# Altium PCB CLLC_PrimarySide_v12.PcbDoc (part 1 of 2)
Units mm, origin at the board's own origin, x right, y up, seen from the top; angles counter-clockwise.
Board outline 148.33 x 167.75 mm, 4 copper layers (GND, SIG, HVDC, GND/OUTPUT), stack 1.369 mm thick; 87 components, 34 nets, 218 pads, 476 vias.
Unrouted connection lines stored in the file: 15.
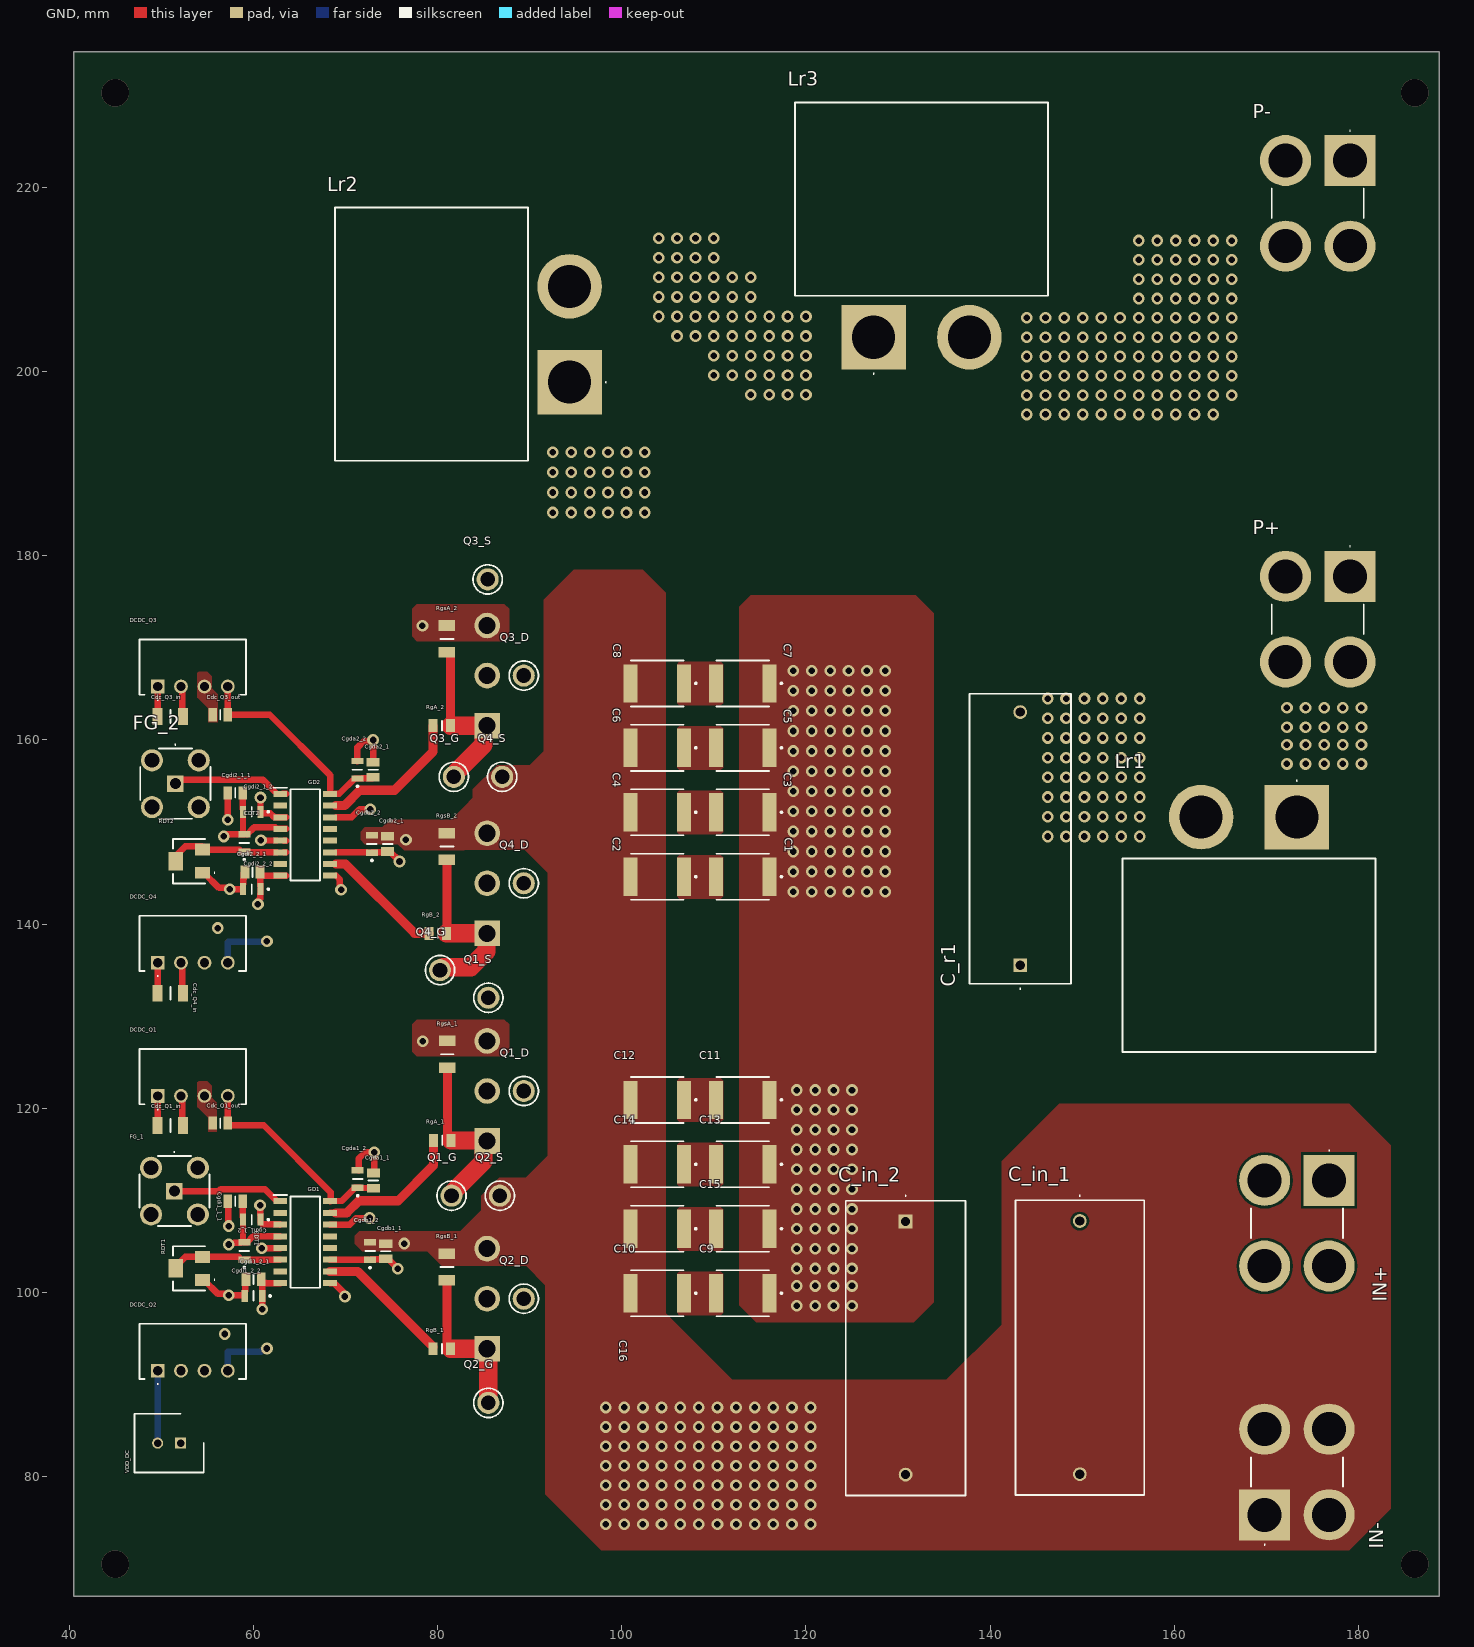
[diagram p0: GND view]
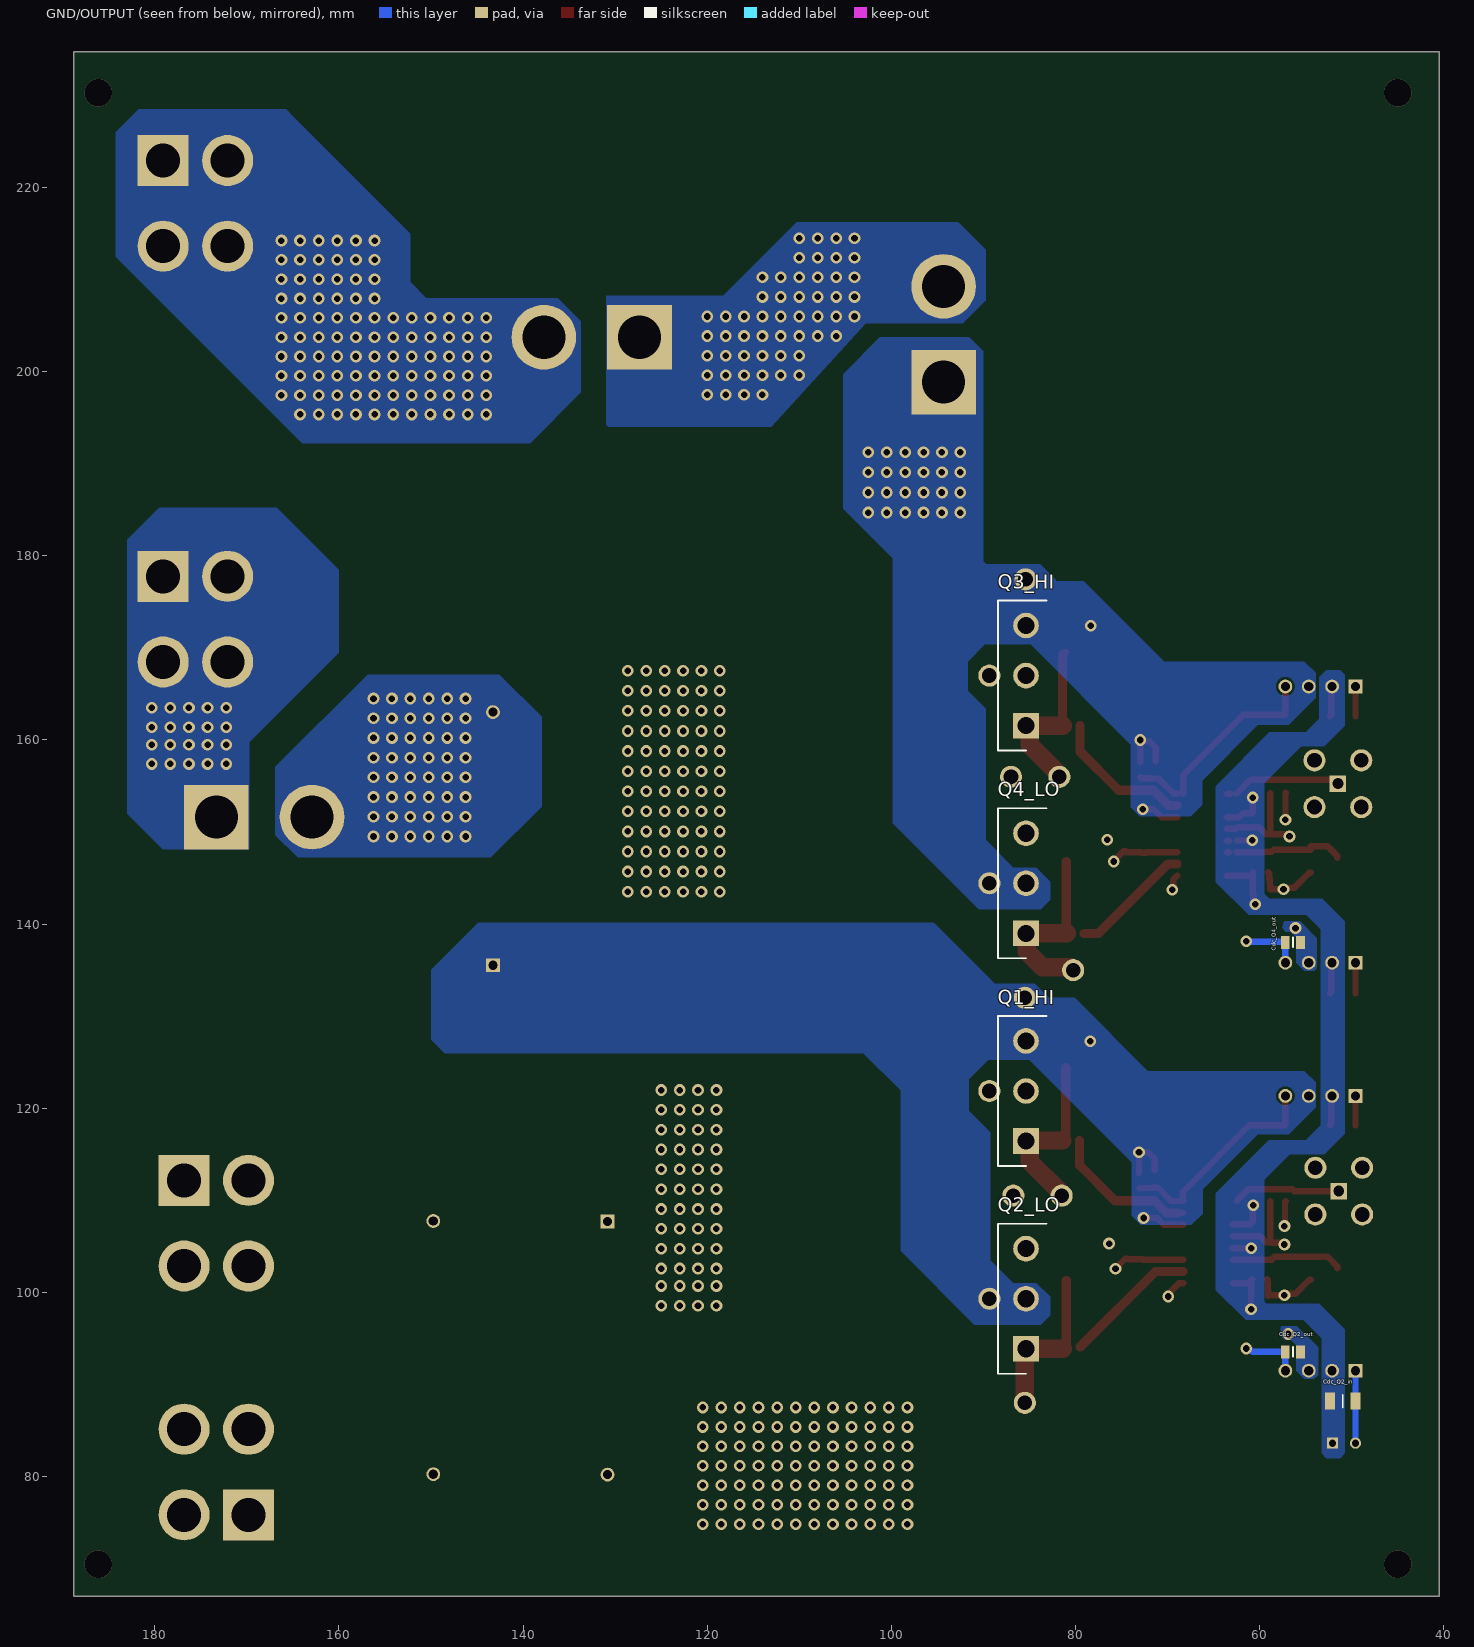
[diagram p1: GND/OUTPUT view, seen from below]
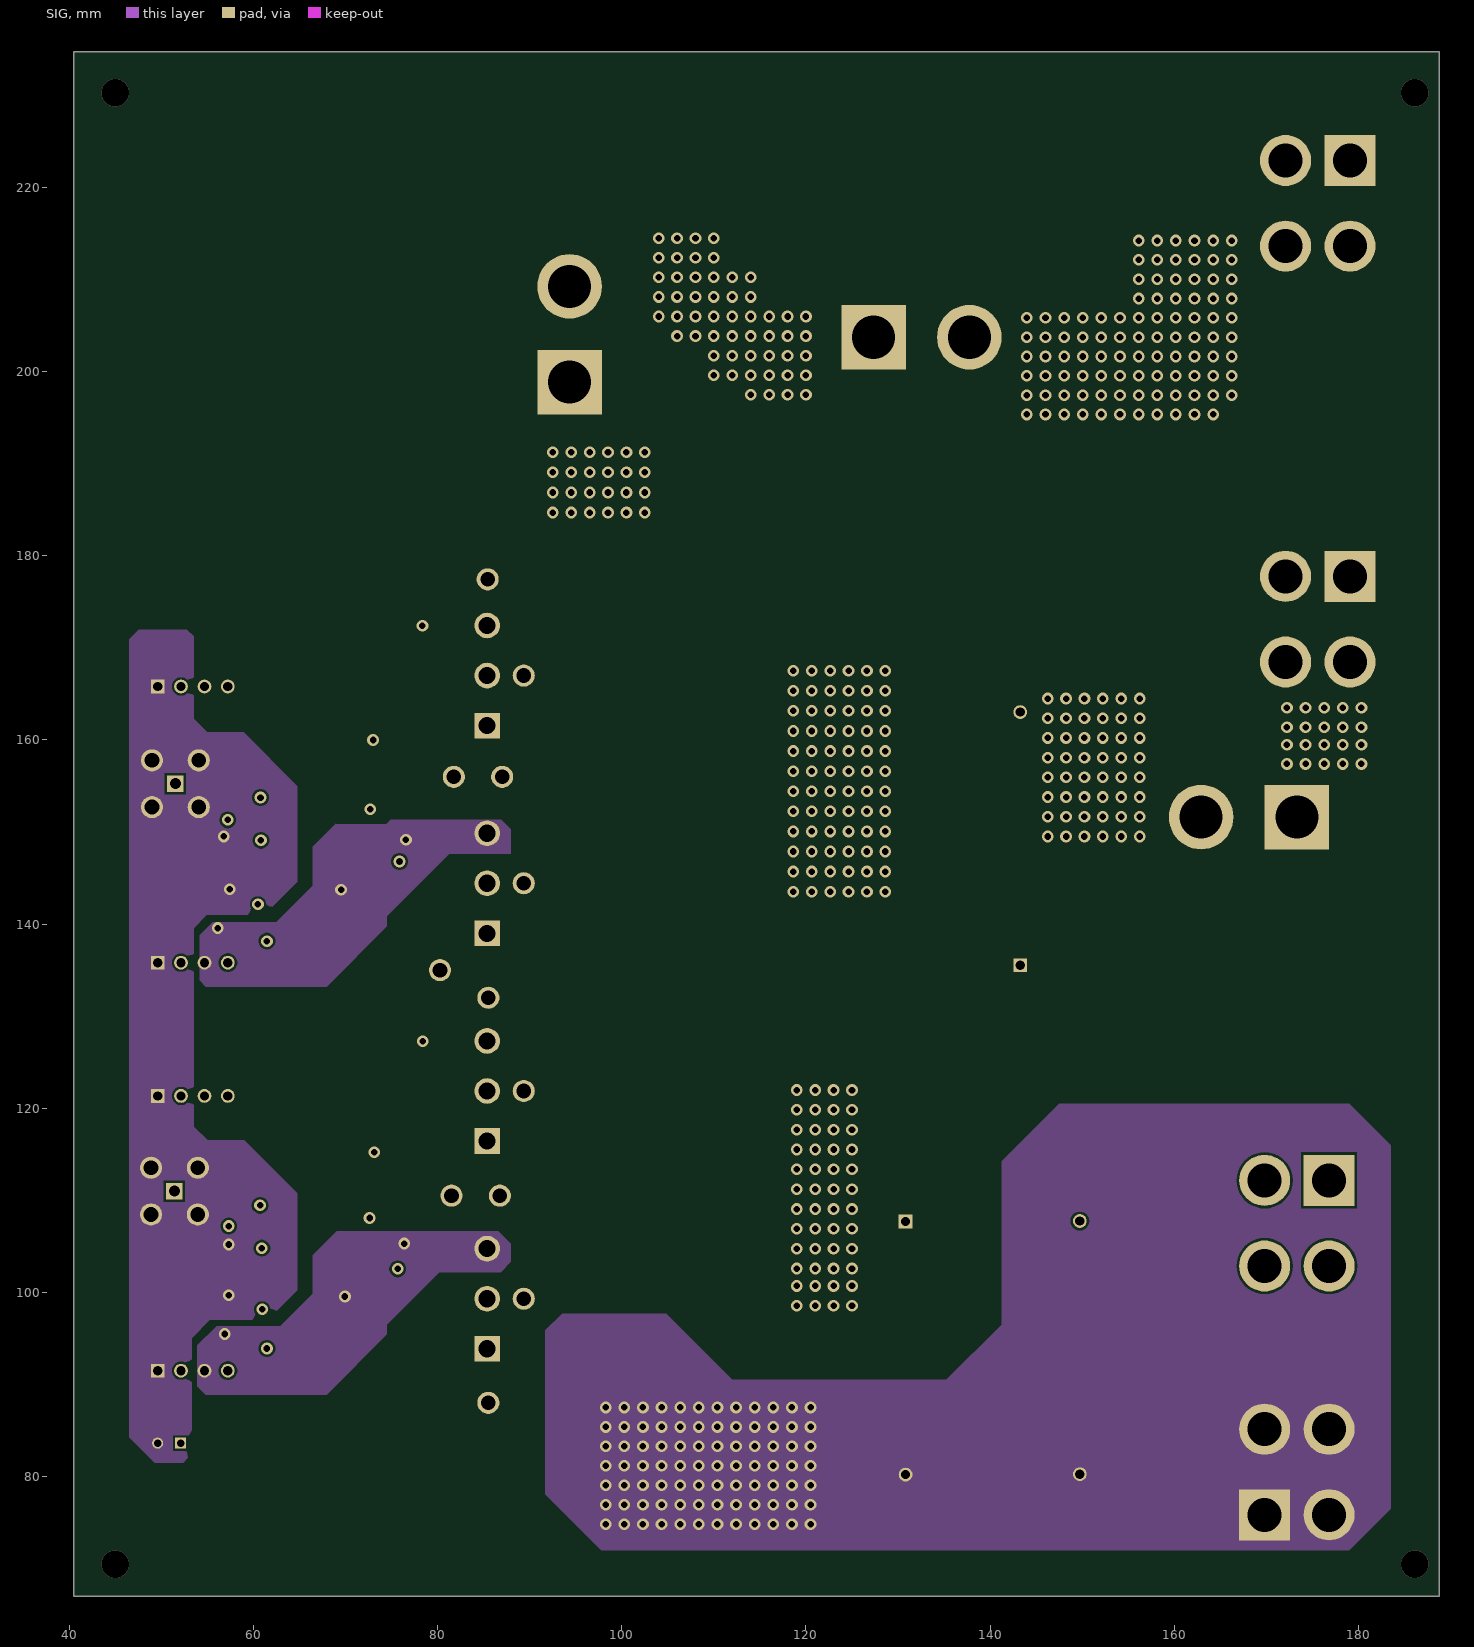
[diagram p2: SIG]
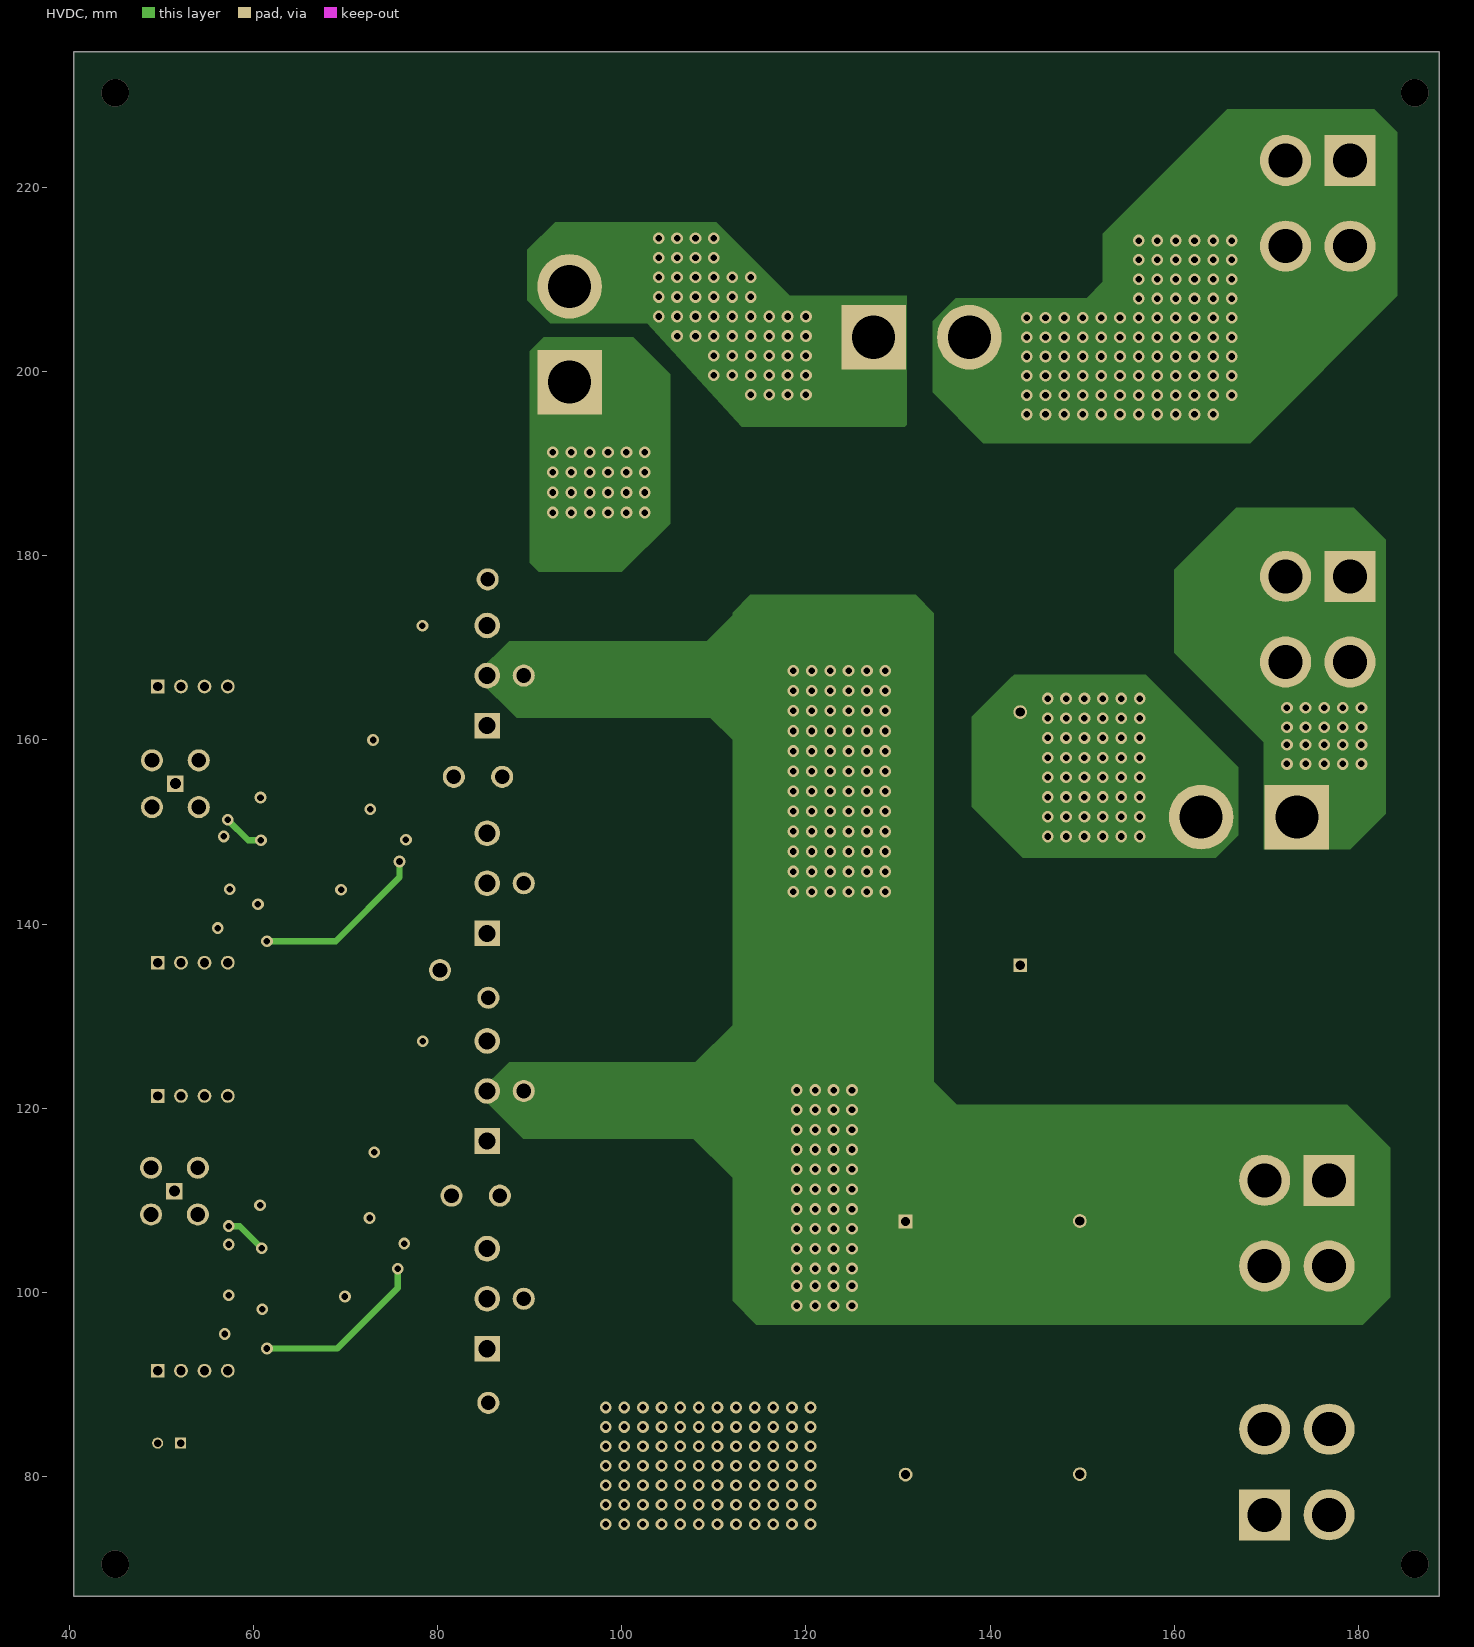
[diagram p3: HVDC]
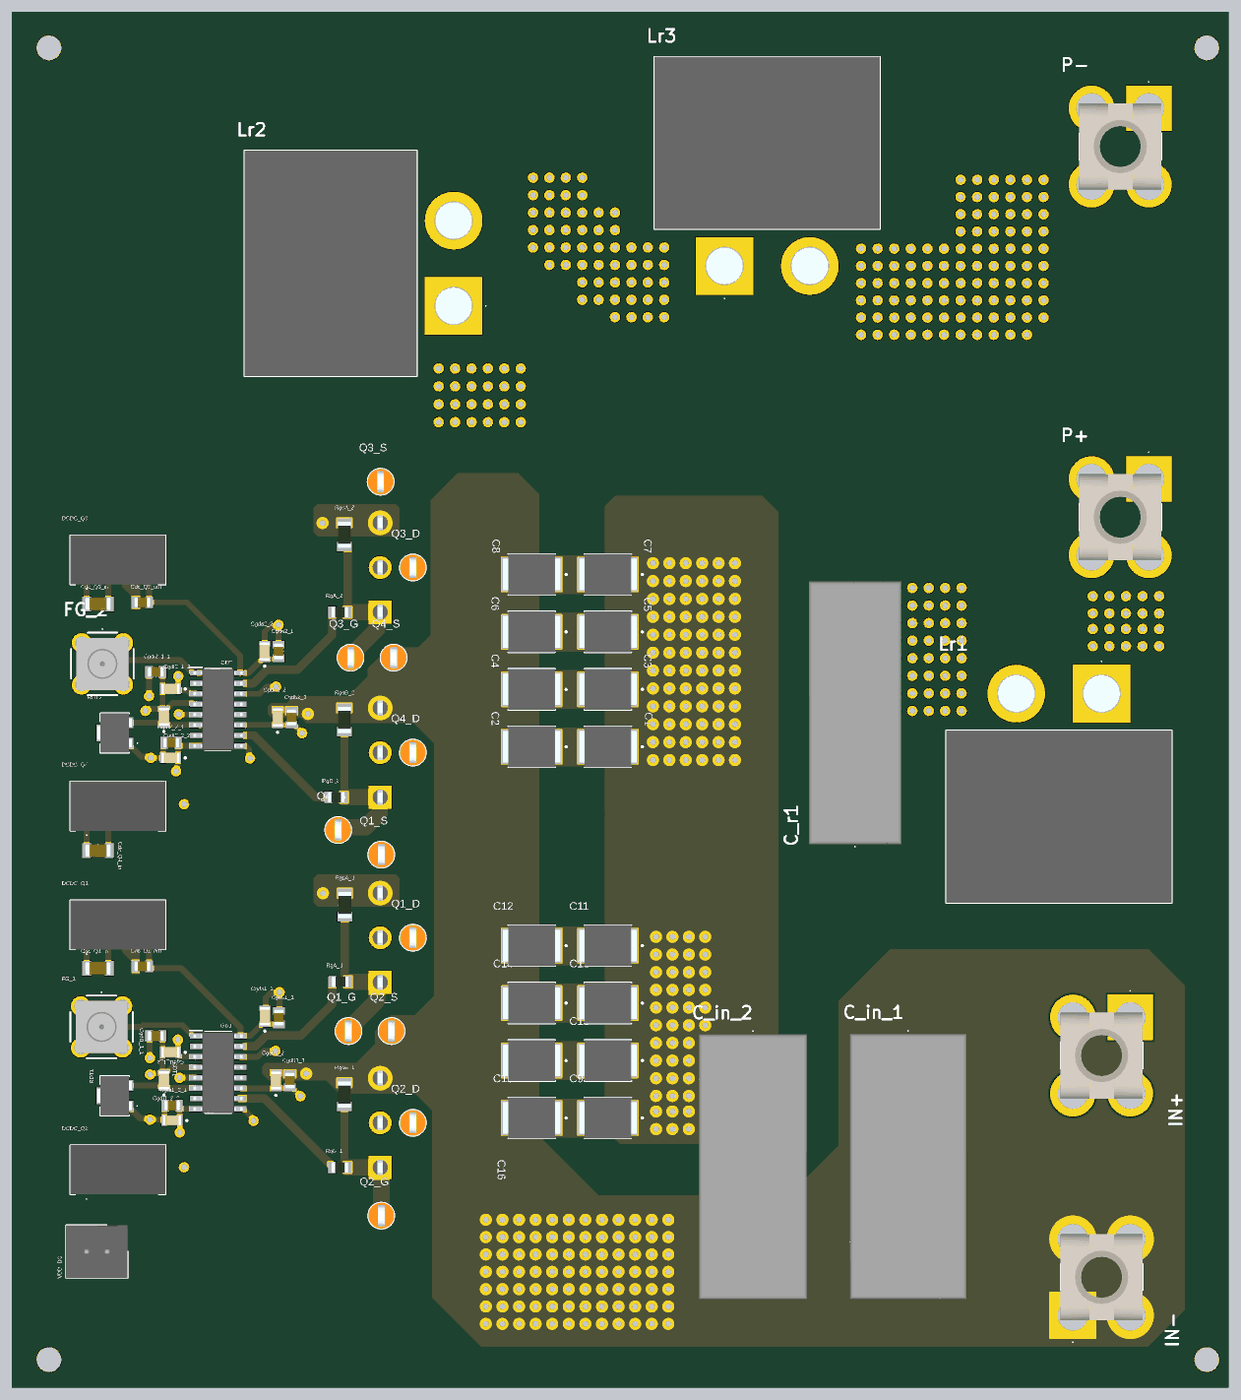
[diagram p4: 3D render of the assembled board from above, using the file's embedded part models]
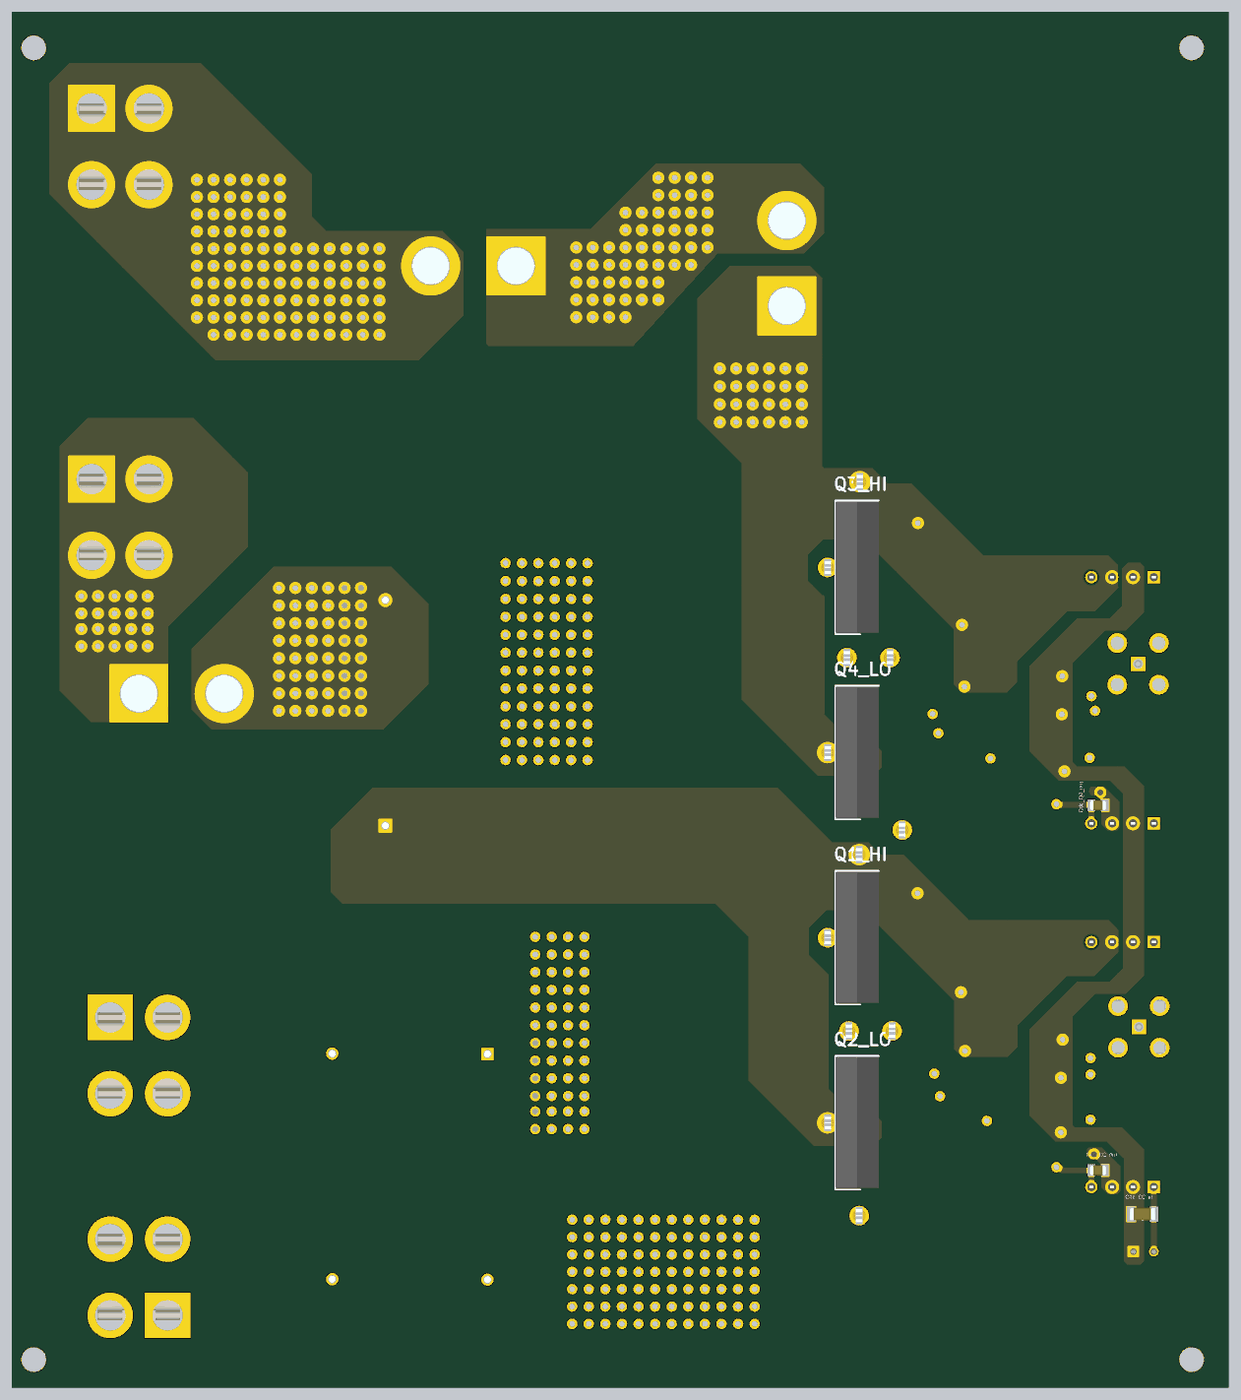
[diagram p5: 3D render of the assembled board from below, using the file's embedded part models]

## Layer stack, top to bottom
Top Solder: solder mask 0.0254, SM-001, Dk 4
GND: signal copper 0.035
Dielectric 1: prepreg 0.1295, PP-017, Dk 4.3
Dielectric 2: prepreg 0.1295, PP-017, Dk 4.3
SIG: signal copper 0.035
Dielectric 3: core 0.7112, Core-039, Dk 4.8
HVDC: signal copper 0.035
Dielectric 4: prepreg 0.1295, PP-017, Dk 4.3
Dielectric 5: prepreg 0.1295, PP-017, Dk 4.3
GND/OUTPUT: signal copper 0.035
Bottom Solder: solder mask 0.0254, SM-001, Dk 4

## Board outline
188.8,234.75 188.8,67 40.475,67 40.475,234.75

## Design rules (kind name [scope] priority, off if disabled: settings)
Clearance Clearance_3 [All] p1: gap=0.254 ignorepadtopadclearanceinfootprint=FALSE
Clearance Clearance_2 [InNet('Q3_S') vs InNet('Q2_S')] p2: gap=1.5 ignorepadtopadclearanceinfootprint=FALSE
Clearance Clearance_1 [InNet('Q1_D') vs InNet('Q1_S')] p3: gap=1.5 ignorepadtopadclearanceinfootprint=FALSE
Clearance [InNet('Q1_S') vs InNet('Q2_S')] p4: gap=1.5 ignorepadtopadclearanceinfootprint=FALSE
PolygonConnect PolygonConnect_11 [All vs IsNamedPolygon('GND-Q2_S') Or IsNamedPolygon('NETC1_2_L01_P158') Or IsNamedPolygon('NETC3_2_L01_P157') Or IsNamedPolygon('NETC5_2_L01_P156') Or IsNamedPolygon('NETC7_2_L01_P155') Or IsNamedPolygon('NETC9_2_L01_P162') Or IsNamedPolygon('NETC11_2_L01_P159') Or IsNamedPolygon('NETC13_2_L01_P160') Or IsNamedPolygon('NETC15_2_L01_P161') Or IsNamedPolygon('Q1_D_L01_P102') Or IsNamedPolygon('Q1_S_L01_P130') Or IsNamedPolygon('Q3_S_L01_P194') Or IsNamedPolygon('Q1_S_L01_P195') Or IsNamedPolygon('Q3_S_L01_P129') Or IsNamedPolygon('NETCDC_Q1_IN_2_L02_P172') Or IsNamedPolygon('Q2_S_L02_P173') Or IsNamedPolygon('Q2_S_L02_P175') Or IsNamedPolygon('HVDC-Q1_D') Or IsNamedPolygon('NETC_R1_2_L03_P143') Or IsNamedPolygon('NETLR1_S1_L03_P151') Or IsNamedPolygon('NETLR2_F1_L03_P145') Or IsNamedPolygon('NETLR3_F1_L03_P152') Or IsNamedPolygon('Q3_S_L03_P163') Or IsNamedPolygon('GND/OUTPUT-NetCdc_Q1_in_1') Or IsNamedPolygon('GND/OUTPUT-Q1_S') Or IsNamedPolygon('GND/OUTPUT-Q3_S') Or IsNamedPolygon('NETC_R1_2_L04_P150') Or IsNamedPolygon('NETLR1_S1_L04_P147') Or IsNamedPolygon('NETLR2_F1_L04_P154') Or IsNamedPolygon('NETLR3_F1_L04_P146') Or IsNamedPolygon('Q2_S_L04_P174') Or IsNamedPolygon('Q2_S_L04_P184')] p1: connectstyle=Direct reliefconductorwidth=0.254 reliefentries=4 polygonreliefangle="90 Angle" airgapwidth=0.254
PolygonConnect PolygonConnect_10 [All vs IsNamedPolygon('GND-Q2_S') Or IsNamedPolygon('NETC1_2_L01_P158') Or IsNamedPolygon('NETC3_2_L01_P157') Or IsNamedPolygon('NETC5_2_L01_P156') Or IsNamedPolygon('NETC7_2_L01_P155') Or IsNamedPolygon('NETC9_2_L01_P162') Or IsNamedPolygon('NETC11_2_L01_P159') Or IsNamedPolygon('NETC13_2_L01_P160') Or IsNamedPolygon('NETC15_2_L01_P161') Or IsNamedPolygon('Q1_D_L01_P102') Or IsNamedPolygon('Q1_S_L01_P130') Or IsNamedPolygon('Q3_S_L01_P129') Or IsNamedPolygon('NETCDC_Q1_IN_2_L02_P172') Or IsNamedPolygon('Q2_S_L02_P173') Or IsNamedPolygon('Q2_S_L02_P175') Or IsNamedPolygon('HVDC-Q1_D') Or IsNamedPolygon('NETC_R1_2_L03_P143') Or IsNamedPolygon('NETLR1_S1_L03_P151') Or IsNamedPolygon('NETLR2_F1_L03_P145') Or IsNamedPolygon('NETLR3_F1_L03_P152') Or IsNamedPolygon('Q3_S_L03_P163') Or IsNamedPolygon('GND/OUTPUT-NetCdc_Q1_in_1') Or IsNamedPolygon('GND/OUTPUT-Q1_S') Or IsNamedPolygon('GND/OUTPUT-Q3_S') Or IsNamedPolygon('NETC_R1_2_L04_P150') Or IsNamedPolygon('NETLR1_S1_L04_P147') Or IsNamedPolygon('NETLR2_F1_L04_P154') Or IsNamedPolygon('NETLR3_F1_L04_P146') Or IsNamedPolygon('Q2_S_L04_P174') Or IsNamedPolygon('Q2_S_L04_P184')] p2: connectstyle=Direct reliefconductorwidth=0.254 reliefentries=4 polygonreliefangle="90 Angle" airgapwidth=0.254
PolygonConnect PolygonConnect_9 [All vs IsNamedPolygon('GND-Q2_S')] p3: connectstyle=Direct reliefconductorwidth=0.254 reliefentries=4 polygonreliefangle="90 Angle" airgapwidth=0.254
PolygonConnect PolygonConnect_8 [All vs IsNamedPolygon('GND-Q2_S') Or IsNamedPolygon('NETC1_2_L01_P158') Or IsNamedPolygon('NETC3_2_L01_P157') Or IsNamedPolygon('NETC5_2_L01_P156') Or IsNamedPolygon('NETC7_2_L01_P155') Or IsNamedPolygon('NETC9_2_L01_P162') Or IsNamedPolygon('NETC11_2_L01_P159') Or IsNamedPolygon('NETC13_2_L01_P160') Or IsNamedPolygon('NETC15_2_L01_P161') Or IsNamedPolygon('Q1_D_L01_P102') Or IsNamedPolygon('Q1_S_L01_P130') Or IsNamedPolygon('Q3_S_L01_P129') Or IsNamedPolygon('NETCDC_Q1_IN_2_L02_P172') Or IsNamedPolygon('Q2_S_L02_P173') Or IsNamedPolygon('Q2_S_L02_P175') Or IsNamedPolygon('HVDC-Q1_D') Or IsNamedPolygon('NETC_R1_2_L03_P143') Or IsNamedPolygon('NETLR1_S1_L03_P151') Or IsNamedPolygon('NETLR2_F1_L03_P145') Or IsNamedPolygon('NETLR3_F1_L03_P152') Or IsNamedPolygon('Q3_S_L03_P163') Or IsNamedPolygon('GND/OUTPUT-NetCdc_Q1_in_1') Or IsNamedPolygon('GND/OUTPUT-No Net') Or IsNamedPolygon('GND/OUTPUT-No Net 1') Or IsNamedPolygon('NETC_R1_2_L04_P150') Or IsNamedPolygon('NETLR1_S1_L04_P147') Or IsNamedPolygon('NETLR2_F1_L04_P154') Or IsNamedPolygon('NETLR3_F1_L04_P146') Or IsNamedPolygon('NONET_L04_P093') Or IsNamedPolygon('NONET_L04_P180') Or IsNamedPolygon('Q2_S_L04_P174') Or IsNamedPolygon('Q2_S_L04_P184') Or IsNamedPolygon('Q3_S_L04_P182')] p4: connectstyle=Direct reliefconductorwidth=0.254 reliefentries=4 polygonreliefangle="90 Angle" airgapwidth=0.254
PolygonConnect PolygonConnect_7 [All vs IsNamedPolygon('GND-Q2_S') Or IsNamedPolygon('NETC1_2_L01_P158') Or IsNamedPolygon('NETC3_2_L01_P157') Or IsNamedPolygon('NETC5_2_L01_P156') Or IsNamedPolygon('NETC7_2_L01_P155') Or IsNamedPolygon('NETC9_2_L01_P162') Or IsNamedPolygon('NETC11_2_L01_P159') Or IsNamedPolygon('NETC13_2_L01_P160') Or IsNamedPolygon('NETC15_2_L01_P161') Or IsNamedPolygon('Q1_D_L01_P102') Or IsNamedPolygon('Q1_S_L01_P130') Or IsNamedPolygon('Q3_S_L01_P129') Or IsNamedPolygon('NETCDC_Q1_IN_2_L02_P096') Or IsNamedPolygon('NONET_L02_P115') Or IsNamedPolygon('Q2_S_L02_P116') Or IsNamedPolygon('HVDC-Q1_D') Or IsNamedPolygon('NETC_R1_2_L03_P143') Or IsNamedPolygon('NETLR1_S1_L03_P151') Or IsNamedPolygon('NETLR2_F1_L03_P145') Or IsNamedPolygon('NETLR3_F1_L03_P152') Or IsNamedPolygon('Q3_S_L03_P163') Or IsNamedPolygon('GND/OUTPUT-No Net') Or IsNamedPolygon('GND/OUTPUT-No Net 1') Or IsNamedPolygon('NETCDC_Q1_IN_1_L04_P095') Or IsNamedPolygon('NETC_R1_2_L04_P150') Or IsNamedPolygon('NETLR1_S1_L04_P147') Or IsNamedPolygon('NETLR2_F1_L04_P154') Or IsNamedPolygon('NETLR3_F1_L04_P146') Or IsNamedPolygon('NONET_L04_P093')] p5: connectstyle=Direct reliefconductorwidth=0.254 reliefentries=4 polygonreliefangle="90 Angle" airgapwidth=0.254
PolygonConnect PolygonConnect_6 [All vs IsNamedPolygon('Q1_D_L01_P102') Or IsNamedPolygon('Q2_S_L01_P103') Or IsNamedPolygon('NETCDC_Q1_IN_2_L02_P096') Or IsNamedPolygon('HVDC-Q1_D') Or IsNamedPolygon('NETCDC_Q1_IN_1_L04_P095') Or IsNamedPolygon('NONET_L04_P093') Or IsNamedPolygon('NONET_L04_P097')] p6: connectstyle=Direct reliefconductorwidth=0.254 reliefentries=4 polygonreliefangle="90 Angle" airgapwidth=0.254
PolygonConnect PolygonConnect_5 [All vs IsNamedPolygon('GND-Q2_S') Or IsNamedPolygon('NONET_L01_P085') Or IsNamedPolygon('NONET_L01_P084') Or IsNamedPolygon('NONET_L01_P083') Or IsNamedPolygon('NONET_L01_P082') Or IsNamedPolygon('NONET_L01_P089') Or IsNamedPolygon('NONET_L01_P086') Or IsNamedPolygon('NONET_L01_P087') Or IsNamedPolygon('NONET_L01_P088') Or IsNamedPolygon('NONET_L01_P090') Or IsNamedPolygon('NONET_L02_P070') Or IsNamedPolygon('SIG-Q1_D') Or IsNamedPolygon('SIG-Q2_S') Or IsNamedPolygon('SIG-Q2_S') Or IsNamedPolygon('HVDC-No Net') Or IsNamedPolygon('NONET_L03_P048') Or IsNamedPolygon('NONET_L03_P080') Or IsNamedPolygon('NONET_L03_P047') Or IsNamedPolygon('GND/OUTPUT-Q1_S') Or IsNamedPolygon('GND/OUTPUT-Q3_S') Or IsNamedPolygon('NONET_L04_P074') Or IsNamedPolygon('NONET_L04_P067') Or IsNamedPolygon('NONET_L04_P049') Or IsNamedPolygon('NONET_L04_P066')] p7: connectstyle=Direct reliefconductorwidth=0.254 reliefentries=4 polygonreliefangle="90 Angle" airgapwidth=0.254
PolygonConnect PolygonConnect_4 [All vs IsNamedPolygon('GND-Q2_S') Or IsNamedPolygon('NONET_L02_P070') Or IsNamedPolygon('SIG-Q1_D') Or IsNamedPolygon('SIG-Q2_S') Or IsNamedPolygon('SIG-Q2_S 1') Or IsNamedPolygon('HVDC-No Net') Or IsNamedPolygon('NONET_L03_P048') Or IsNamedPolygon('NONET_L03_P080') Or IsNamedPolygon('NONET_L03_P047') Or IsNamedPolygon('GND/OUTPUT-Q1_S') Or IsNamedPolygon('GND/OUTPUT-Q3_S') Or IsNamedPolygon('NONET_L04_P074') Or IsNamedPolygon('NONET_L04_P067') Or IsNamedPolygon('NONET_L04_P049') Or IsNamedPolygon('NONET_L04_P066')] p8: connectstyle=Direct reliefconductorwidth=0.254 reliefentries=4 polygonreliefangle="90 Angle" airgapwidth=0.254
PolygonConnect PolygonConnect_3 [All vs IsNamedPolygon('NONET_L04_P070') Or IsNamedPolygon('NONET_L04_P080') Or IsNamedPolygon('NONET_L04_P083') Or IsNamedPolygon('NONET_L04_P082') Or IsNamedPolygon('NONET_L04_P081')] p9: connectstyle=Direct reliefconductorwidth=0.254 reliefentries=4 polygonreliefangle="90 Angle" airgapwidth=0.254
PolygonConnect PolygonConnect_2 [All vs IsNamedPolygon('NONET_L01_P074') Or IsNamedPolygon('NONET_L01_P033') Or IsNamedPolygon('NONET_L01_P032') Or IsNamedPolygon('NONET_L01_P076') Or IsNamedPolygon('Signal_1-Q1_D') Or IsNamedPolygon('GND-Q2_S') Or IsNamedPolygon('NONET_L02_P077') Or IsNamedPolygon('NONET_L02_P068') Or IsNamedPolygon('Int2 (PWR)-Q1_D') Or IsNamedPolygon('Int2 (PWR)-Q1_S') Or IsNamedPolygon('Int2 (PWR)-Q3_S') Or IsNamedPolygon('NONET_L03_P028') Or IsNamedPolygon('NONET_L03_P034') Or IsNamedPolygon('NETLR2_F1_L03_P035') Or IsNamedPolygon('NONET_L03_P056') Or IsNamedPolygon('NONET_L03_P079') Or IsNamedPolygon('NONET_L04_P024') Or IsNamedPolygon('NONET_L04_P026') Or IsNamedPolygon('NONET_L04_P027') Or IsNamedPolygon('NONET_L04_P070') Or IsNamedPolygon('NONET_L04_P023') Or IsNamedPolygon('NONET_L04_P021') Or IsNamedPolygon('NONET_L04_P058') Or IsNamedPolygon('Signal_2-Q1_S')] p10: connectstyle=Direct reliefconductorwidth=0.254 reliefentries=4 polygonreliefangle="90 Angle" airgapwidth=0.254
PolygonConnect PolygonConnect_1 [All vs IsNamedPolygon('Int2 (PWR)-Q1_S') Or IsNamedPolygon('Int2 (PWR)-Q1_S 1') Or IsNamedPolygon('NETC_R1_2_L03_P005')] p11: connectstyle=Direct reliefconductorwidth=0.254 reliefentries=4 polygonreliefangle="90 Angle" airgapwidth=0.254
PolygonConnect [All] p12: connectstyle=Relief reliefconductorwidth=0.254 reliefentries=4 polygonreliefangle="90 Angle" airgapwidth=0.254
RoutingVias [All] p1: holewidth=0.711 width=1.27 viastyle="Through Hole" minholewidth=0.711 minwidth=1.27 maxholewidth=0.711 maxwidth=1.27
SolderMaskExpansion [All] p1: expansion=0.102 istentingtop=FALSE
SupplyNets "Schematic Supply Nets_1" [InNet('Q2_S')] p1: voltage=0.000
Width [All] p1: maxlimit=2 minlimit=0.7 preferedwidth=0.7 midlayer1_maxwidth=0.7 midlayer2_maxwidth=0.7 bottomlayer_maxwidth=0.7 minimp=50.000000 maximp=50.000000 favimp=50.000000
30 further rules are at their usual default settings.

## Classes and differential pairs
component class GD: Cdc_Q1_in Cdc_Q1_out Cdc_Q2_in Cdc_Q2_out Cdc_Q3_in Cdc_Q3_out Cdc_Q4_in Cdc_Q4_out CDT1 CDT2 Cgda1_1 Cgda1_2 Cgda2_1 Cgda2_2 Cgdb1_1 Cgdb1_2 Cgdb2_1 Cgdb2_2 Cgdi1_1_1 Cgdi1_1_2 Cgdi1_2_1 Cgdi1_2_2 Cgdi2_1_1 Cgdi2_1_2 Cgdi2_2_1 Cgdi2_2_2 DCDC_Q1 DCDC_Q2 DCDC_Q3 DCDC_Q4 FG_1 FG_2 GD1 GD2 RDT1 RDT2 RgA_1 RgA_2 RgB_1 RgB_2 RgsA_1 RgsA_2 RgsB_1 RgsB_2 VDD_DC
component class PrimarySide: C1 C2 C3 C4 C5 C6 C7 C8 C9 C10 C11 C12 C13 C14 C15 C16 C_in_1 C_in_2 C_r1 IN+ IN- Lr1 Lr2 Lr3 P+ P- Q1_D Q1_G Q1_HI Q1_S Q2_D Q2_G Q2_LO Q2_S Q3_D Q3_G Q3_HI Q3_S Q4_D Q4_G Q4_LO Q4_S

## Components (designator, comment, footprint, x,y, rotation, side; value= is the part's Value field where it differs from the comment)
C1 "GCJ55DR7LV474KW01K" GCJ55D 113.137,145.15 r180 top
C2 "GCJ55DR7LV474KW01K" GCJ55D 103.837,145.15 r180 top
C3 "GCJ55DR7LV474KW01K" GCJ55D 113.137,152.15 r180 top
C4 "GCJ55DR7LV474KW01K" GCJ55D 103.837,152.15 r180 top
C5 "GCJ55DR7LV474KW01K" GCJ55D 113.137,159.15 r180 top
C6 "GCJ55DR7LV474KW01K" GCJ55D 103.837,159.15 r180 top
C7 "GCJ55DR7LV474KW01K" GCJ55D 113.137,166.15 r180 top
C8 "GCJ55DR7LV474KW01K" GCJ55D 103.837,166.15 r180 top
C9 "GCJ55DR7LV474KW01K" GCJ55D 113.137,99.91 r180 top
C10 "GCJ55DR7LV474KW01K" GCJ55D 103.837,99.91 r180 top
C11 "GCJ55DR7LV474KW01K" GCJ55D 113.137,120.91 r180 top
C12 "GCJ55DR7LV474KW01K" GCJ55D 103.837,120.91 r180 top
C13 "GCJ55DR7LV474KW01K" GCJ55D 113.137,113.91 r180 top
C14 "GCJ55DR7LV474KW01K" GCJ55D 103.837,113.91 r180 top
C15 "GCJ55DR7LV474KW01K" GCJ55D 113.137,106.91 r180 top
C16 "GCJ55DR7LV474KW01K" GCJ55D 103.837,106.91 r180 top
C_in_1 "R71XR510050H0K" R71XR510050H0K 149.75,107.75 r270 top
C_in_2 "R76MR4100SE40K" R76MR4100SE40K 130.825,107.7 r270 top
C_r1 "C4AQQBU4140M1WJ" C4AQQBU4140M1WJ 143.275,135.525 r90 top
Cdc_Q1_in "GRM31CR71H475KA12L" CAPC3216X180N 50.96,118.136 r180 top
Cdc_Q1_out "GCM21BR71H105KA03L" CAPC2012X140N 56.38,118.386 r180 top
Cdc_Q2_in "GRM31CR71H475KA12L" CAPC3216X180N 50.96,88.186 r180 bottom
Cdc_Q2_out "GCM21BR71H105KA03L" CAPC2012X140N 56.38,93.525 r180 bottom
Cdc_Q3_in "GRM31CR71H475KA12L" CAPC3216X180N 50.96,162.555 r180 top
Cdc_Q3_out "GCM21BR71H105KA03L" CAPC2012X140N 56.38,162.75 r180 top
Cdc_Q4_in "GRM31CR71H475KA12L" CAPC3216X180N 50.96,132.5 r180 top
Cdc_Q4_out "GCM21BR71H105KA03L" CAPC2012X140N 56.38,138.011 r180 bottom
CDT1 "GCM21BR72A104MA37K" GCM21 59,104.5 r90 top
CDT2 "GCM21BR72A104MA37K" GCM21 59,148.8 r90 top
Cgda1_1 "GCM21BR71H105KA03L" CAPC2012X140N 73.007,112.14 r90 top
Cgda1_2 "GCM21BR72A104MA37K" GCM21 71.307,112.3 r90 top
Cgda2_1 "GCM21BR71H105KA03L" CAPC2012X140N 72.982,156.765 r90 top
Cgda2_2 "GCM21BR72A104MA37K" GCM21 71.282,156.77 r90 top
Cgdb1_1 "GCM21BR71H105KA03L" CAPC2012X140N 74.35,104.465 r90 top
Cgdb1_2 "GCM21BR72A104MA37K" GCM21 72.65,104.475 r90 top
Cgdb2_1 "GCM21BR71H105KA03L" CAPC2012X140N 74.557,148.715 r90 top
Cgdb2_2 "GCM21BR72A104MA37K" GCM21 72.857,148.715 r90 top
Cgdi1_1_1 "GCM21BR71H105KA03L" CAPC2012X140N 58,109.9 r0 top
Cgdi1_1_2 "GCM21BR72A104MA37K" GCM21 59.8,107.9 r180 top
Cgdi1_2_1 "GCM21BR71H105KA03L" CAPC2012X140N 60,101.429 r180 top
Cgdi1_2_2 "GCM21BR72A104MA37K" GCM21 59.99,99.607 r180 top
Cgdi2_1_1 "GCM21BR71H105KA03L" CAPC2012X140N 58,154.25 r0 top
Cgdi2_1_2 "GCM21BR72A104MA37K" GCM21 59.8,152.2 r180 top
Cgdi2_2_1 "GCM21BR71H105KA03L" CAPC2012X140N 59.884,145.645 r180 top
Cgdi2_2_2 "GCM21BR72A104MA37K" GCM21 59.8,143.8 r180 top
DCDC_Q1 "PQS075-S5-S15-S" PQS075S5S15S 49.58,121.341 r0 top
DCDC_Q2 "PQS075-S5-S15-S" PQS075S5S15S 49.58,91.491 r0 top
DCDC_Q3 "PQS075-S5-S15-S" PQS075S5S15S 49.58,165.814 r0 top
DCDC_Q4 "PQS075-S5-S15-S" PQS075S5S15S 49.58,135.811 r0 top
FG_1 "413990-1" 4139901 51.4,111 r270 top
FG_2 "413990-1" 4139901 51.5,155.25 r270 top
GD1 "SI8274GB4D-IS1" SOIC127P600X175-16N 65.606,105.455 r0 top
GD2 "SI8274GB4D-IS1" SOIC127P600X175-16N 65.606,149.7 r0 top
IN+ "AMT0450028DB0000G" AMT0450028DB0000G 176.825,112.163 r180 top
IN- "AMT0450028DB0000G" AMT0450028DB0000G 169.825,75.837 r0 top
Lr1 "ER26A2DC-6R8K" ER26A2DC6R8K 173.325,151.625 r180 top
Lr2 "ER26A2DC-6R8K" ER26A2DC6R8K 94.325,198.875 r90 top
Lr3 "ER26A2DC-6R8K" ER26A2DC6R8K 127.35,203.75 r0 top
P+ "AMT0450028DB0000G" AMT0450028DB0000G 179.098,177.775 r180 top
P- "AMT0450028DB0000G" AMT0450028DB0000G 179.098,222.95 r180 top
Q1_D "5013" 5013 89.35,121.872 r270 top
Q1_G "5013" 5013 81.5,110.5 r270 top
Q1_HI "IPW65R050CFD7AXKSA1" TO544P530X1590X2600-3P 85.373,116.432 r90 bottom
Q1_S "5013" 5013 85.5,132 r270 top
Q2_D "5013" 5013 89.35,99.31 r270 top
Q2_G "5013" 5013 85.5,88 r270 top
Q2_LO "IPW65R050CFD7AXKSA1" TO544P530X1590X2600-3P 85.373,93.87 r90 bottom
Q2_S "5013" 5013 86.75,110.5 r270 top
Q3_D "5013" 5013 89.35,166.997 r270 top
Q3_G "5013" 5013 81.75,156 r270 top
Q3_HI "IPW65R050CFD7AXKSA1" TO544P530X1590X2600-3P 85.373,161.557 r90 bottom
Q3_S "5013" 5013 85.425,177.45 r270 top
Q4_D "5013" 5013 89.35,144.434 r270 top
Q4_G "5013" 5013 80.25,135 r270 top
Q4_LO "IPW65R050CFD7AXKSA1" TO544P530X1590X2600-3P 85.373,138.994 r90 bottom
Q4_S "5013" 5013 87,156 r270 top
RDT1 "3224W-1-104G" 3224W1104G 53,102.614 r180 top
RDT2 "3224W-1-104G" 3224W1104G 53,146.83 r180 top
RgA_1 "ESR10EZPF15R0" RESC2012X65N 80.5,116.5 r0 top
RgA_2 "ESR10EZPF15R0" RESC2012X65N 80.45,161.557 r0 top
RgB_1 "ESR10EZPF15R0" RESC2012X65N 80.45,93.87 r0 top
RgB_2 "ESR10EZPF15R0" RESC2012X65N 80,138.994 r0 top
RgsA_1 "ESR18EZPF1002" RESC3216X65N 81.05,125.862 r90 top
RgsA_2 "ESR18EZPF1002" RESC3216X65N 81,170.987 r90 top
RgsB_1 "ESR18EZPF1002" RESC3216X65N 81,102.75 r90 top
RgsB_2 "ESR18EZPF1002" RESC3216X65N 81,148.424 r90 top
VDD_DC "B02B-XASK-1_LF__SN_" SHDR2W60P0X250_1X2_750X640X880P 52.08,83.62 r180 top

## Footprints (in the part's own frame and the unit in brackets; to place one, negate y for a bottom-side part, rotate by r counter-clockwise, add the part's x,y. Pads: shape width x height; smd on the part's side, far side on the other; paste and mask are expansions set on the pad)
3224W1104G [mm]
  rect 1.6x1.3 smd: 1(-1.45,1.25) 3(-1.45,-1.25)
  rect 1.6x2 smd: 2(1.45,0)
  silkscreen extent -2.8,-2.4 1.75,2.4, body extent -2.12,-2.4 2.09,2.4, height 5.65
5013 [mm]
  round 2.4 hole 1.6: 1(0,0)
  silkscreen extent -1.59,-1.59 1.59,1.59, body extent -1.58,-1.59 1.58,1.59, height 8.63
4139901 [mm]
  rect 1.785x1.785 hole 1.19: 1(0,0)
  round 2.4 hole 1.6: 2(-2.54,-2.54) 3(2.54,-2.54) 4(2.54,2.54) 5(-2.54,2.54)
  silkscreen extent -4.3,-3.81 3.81,3.81, body extent -3.18,-3.18 3.18,3.17, height 8.05
AMT0450028DB0000G [mm]
  rect 5.55x5.55 hole 3.7: 1(0,0)
  round 5.55 hole 3.7: 2(0,9.3) 3(7,0) 4(7,9.3)
  silkscreen extent -1.5,-3.3 8.5,6.25, body extent -1.5,-0.6 8.5,9.9, height 7.59
C4AQQBU4140M1WJ [mm]
  rect 1.5x1.5 hole 1: 1(0,0)
  round 1.5 hole 1: 2(27.5,0)
  silkscreen extent -2.6,-5.5 29.5,5.5, body extent -2.25,-5.66 29.75,5.65, height 20.16
CAPC2012X140N [mm]
  rect 0.94x1.43 smd: 1(-0.82,0) 2(0.82,0)
  silkscreen extent 0,-0.53 0,0.53, body extent -1,-0.63 1,0.63, height 1.4
CAPC3216X180N [mm]
  rect 1.07x1.82 smd: 1(-1.38,0) 2(1.38,0)
  silkscreen extent 0,-0.7 0,0.7, body extent -1.6,-0.8 1.6,0.8, height 1.8
ER26A2DC6R8K [mm]
  round 7.02 hole 4.68: F1(10.4,0)
  rect 7.02x7.02 hole 4.68: S1(0,0)
  silkscreen extent -8.55,-4 18.95,25.5, body extent -8.55,-2.23 18.95,25.5, height 17.1
GCJ55D [mm]
  rect 1.5x4.15 smd: 1(-2.9,0) 2(2.9,0)
  silkscreen extent -4.3,-2.5 2.85,2.5, body extent -3.5,-2.5 3.5,2.5, height 2.1
GCM21 [mm]
  rect 0.7x1.3 smd: 1(-0.95,0) 2(0.95,0)
  silkscreen extent -1.9,-0.53 0,0.53, body extent -1.1,-0.63 1.1,0.63, height 1.45
PQS075S5S15S [mm]
  rect 1.5x1.5 hole 1: 1(0,0)
  round 1.5 hole 1: 2(2.54,0) 3(5.08,0) 4(7.62,0)
  silkscreen extent -1.99,-1.5 9.61,5.1, body extent -1.99,-0.89 9.61,5.1, height 10.26
R71XR510050H0K [mm]
  round 1.5 hole 1: 1(0,0) 2(27.5,0)
  silkscreen extent -2.8,-7 29.75,7, body extent -2.4,-7.1 29.9,7.1, height 28.1
R76MR4100SE40K [mm]
  rect 1.5x1.5 hole 1: 1(0,0)
  round 1.5 hole 1: 2(27.5,0)
  silkscreen extent -2.85,-6.5 29.75,6.5, body extent -2.4,-6.61 29.9,6.6, height 23.39
RESC2012X65N [mm]
  rect 1x1.4 smd: 1(-0.95,0) 2(0.95,0)
  silkscreen extent 0,-0.53 0,0.53, body extent -1,-0.63 1,0.63, height 0.65
RESC3216X65N [mm]
  rect 1.15x1.8 smd: 1(-1.45,0) 2(1.45,0)
  silkscreen extent 0,-0.7 0,0.7, body extent -1.6,-0.8 1.6,0.8, height 0.65
SHDR2W60P0X250_1X2_750X640X880P [mm]
  rect 1.2x1.2 hole 0.8: 1(0,0)
  round 1.2 hole 0.8: 2(2.5,0)
  silkscreen extent -2.5,-3.2 5,3.2, body extent -2.5,-3.2 5,3.2, height 8.8
SOIC127P600X175-16N [mm]
  rect 1.5x0.65 smd: 1(-2.7,4.445) 2(-2.7,3.175) 3(-2.7,1.905) 4(-2.7,0.635) 5(-2.7,-0.635) 6(-2.7,-1.905) 7(-2.7,-3.175) 8(-2.7,-4.445) 9(2.7,-4.445) 10(2.7,-3.175) 11(2.7,-1.905) 12(2.7,-0.635) 13(2.7,0.635) 14(2.7,1.905) 15(2.7,3.175) 16(2.7,4.445)
  silkscreen extent -3.45,-4.95 1.6,5.12, body extent -3,-4.95 3,4.95, height 1.75
TO544P530X1590X2600-3P [mm]
  rect 2.79x2.79 hole 1.86: 1(0,0)
  round 2.79 hole 1.86: 2(5.44,0) 3(10.88,0)
  silkscreen extent -2.71,-2.25 13.59,3.05, body extent -2.51,-2.26 13.39,3.05, height 26

## Part data
C1 C2 C3 C4 C5 C6 C7 C8 C9 C10 C11 C12 C13 C14 C15 C16: "Capacitor", Manufacturer_Name="Murata Electronics", Mouser Part Number=81-GCJ55D7LV474KW01K, Datasheet Link=https://search.murata.co.jp/Ceramy/image/img/A01X/G101/ENG/GCJ55DR7LV474KW01-00B.pdf, Height=2mm, Manufacturer_Part_Number=GCJ55DR7LV474KW01K, Mouser Price/Stock=https://www.mouser.co.uk/ProductDetail/Murata-Electronics/GCJ55DR7LV474KW01K?qs=By6Nw2ByBD00cj4z4sTn5Q%3D%3D
C_in_1: "Capacitor", Manufacturer_Name=KEMET, Mouser Part Number=80-R71XR510050H0K, Arrow Part Number=R71XR510050H0K, Arrow Price/Stock=https://www.arrow.com/en/products/r71xr510050h0k/kemet-corporation?region=europe, Datasheet Link=https://content.kemet.com/datasheets/KEM_F3130_R71H.pdf, Height=28.1mm, Manufacturer_Part_Number=R71XR510050H0K, Mouser Price/Stock=https://www.mouser.co.uk/ProductDetail/KEMET/R71XR510050H0K?qs=Jslch3jnSjmgqBZUL0Ww4w%3D%3D
C_in_2: "Capacitor", Manufacturer_Name=KEMET, Mouser Part Number=80-R76MR4100SE40K, Arrow Part Number=R76MR4100SE40K, Arrow Price/Stock=https://www.arrow.com/en/products/r76mr4100se40k/kemet-corporation, Datasheet Link=https://search.kemet.com/component-documentation/download/specsheet/R76MR4100SE40K, Height=22.1mm, Manufacturer_Part_Number=R76MR4100SE40K, Mouser Price/Stock=https://www.mouser.com/Search/Refine.aspx?Keyword=80-R76MR4100SE40K
C_r1: "Capacitor", Manufacturer_Name=KEMET, Mouser Part Number=80-C4AQQBU4140M1WJ, Datasheet Link=https://search.kemet.com/component-documentation/download/specsheet/C4AQQBU4140M1WJ, Height=20.2mm, Manufacturer_Part_Number=C4AQQBU4140M1WJ, Mouser Price/Stock=https://www.mouser.co.uk/ProductDetail/KEMET/C4AQQBU4140M1WJ?qs=81r%252BiQLm7BSMlBltxrghzA%3D%3D
Cdc_Q1_in Cdc_Q2_in Cdc_Q3_in Cdc_Q4_in: "Capacitor", Manufacturer_Name="Murata Electronics", Mouser Part Number=81-GRM31CR71H475KA2L, Arrow Part Number=GRM31CR71H475KA12L, Arrow Price/Stock=https://www.arrow.com/en/products/grm31cr71h475ka12l/murata-manufacturing?utm_currency=USD&region=nac, Datasheet Link=https://search.murata.co.jp/Ceramy/image/img/A01X/G101/ENG/GRM31CR71H475KA12-01A.pdf, Height=1.8mm, Manufacturer_Part_Number=GRM31CR71H475KA12L, Mouser Price/Stock=https://www.mouser.co.uk/ProductDetail/Murata-Electronics/GRM31CR71H475KA12L?qs=QOxk%252BkhTc6I%252BVQUsJuOHog%3D%3D
Cdc_Q1_out Cdc_Q2_out Cdc_Q3_out Cdc_Q4_out Cgda1_1 Cgda2_1 Cgdb1_1 Cgdb2_1 Cgdi1_1_1 Cgdi1_2_1 Cgdi2_1_1 Cgdi2_2_1: "Capacitor", Manufacturer_Name="Murata Electronics", Mouser Part Number=81-GCM21BR71H105KA3L, Arrow Part Number=GCM21BR71H105KA03L, Arrow Price/Stock=https://www.arrow.com/en/products/gcm21br71h105ka03l/murata-manufacturing?utm_currency=USD&region=nac, Datasheet Link=https://search.murata.co.jp/Ceramy/image/img/A01X/G101/ENG/GCM21BR71H105KA03-01A.pdf, Height=1.4mm, Manufacturer_Part_Number=GCM21BR71H105KA03L, Mouser Price/Stock=https://www.mouser.co.uk/ProductDetail/Murata-Electronics/GCM21BR71H105KA03L?qs=74rrZF77WIzs3UJkpPZdKw%3D%3D
CDT1 CDT2 Cgda1_2 Cgda2_2 Cgdb1_2 Cgdb2_2 Cgdi1_1_2 Cgdi1_2_2 Cgdi2_1_2 Cgdi2_2_2: "Capacitor", Manufacturer_Name="Murata Electronics", Datasheet Link=https://search.murata.co.jp/Ceramy/image/img/A01X/G101/ENG/GCM21BR72A104MA37-01A.pdf, Height=1.4mm, Manufacturer_Part_Number=GCM21BR72A104MA37K
DCDC_Q1 DCDC_Q2 DCDC_Q3 DCDC_Q4: "Integrated Circuit", Manufacturer_Name="CUI Inc.", Mouser Part Number=490-PQS075-S5-S15-S, Datasheet Link=https://www.cui.com/product/resource/pdf/pqs075-s.pdf, Height=10.41mm, Manufacturer_Part_Number=PQS075-S5-S15-S, Mouser Price/Stock=https://www.mouser.co.uk/ProductDetail/CUI-Inc/PQS075-S5-S15-S/?qs=26oI9%252Bq63sIfifa58tSGNg%3D%3D
FG_1 FG_2: "Connector", Manufacturer_Name="TE Connectivity", Mouser Part Number=571-4139901, Arrow Part Number=413990-1, Arrow Price/Stock=https://www.arrow.com/en/products/413990-1/te-connectivity?region=europe, Datasheet Link=https://www.te.com/commerce/DocumentDelivery/DDEController?Action=srchrtrv&DocNm=1307191_SMB_Connectors&DocType=Catalog%20Section&DocLang=English&PartCntxt=413990-1&DocFormat=pdf, Height=7.62mm, Manufacturer_Part_Number=413990-1, Mouser Price/Stock=https://www.mouser.co.uk/ProductDetail/TE-Connectivity/413990-1?qs=7QuPeZUaY4GhWa7hqv5PMQ%3D%3D
GD1 GD2: "Integrated Circuit", Manufacturer_Name=Skyworks, Mouser Part Number=634-SI8274GB4D-IS1, Datasheet Link=https://www.skyworksinc.com/-/media/Skyworks/SL/documents/public/data-sheets/Si827x.pdf, Height=1.75mm, Manufacturer_Part_Number=SI8274GB4D-IS1, Mouser Price/Stock=https://www.mouser.co.uk/ProductDetail/Skyworks-Solutions-Inc/SI8274GB4D-IS1?qs=j6MGy4L9yX3Ou%2FIj7aSdKQ%3D%3D
IN+ IN- P+ P-: "Connector", Manufacturer_Name=Amphenol, Mouser Part Number=523-AMT0450028DB000G, Datasheet Link=https://www.anytek.com.cn/Upload/AMT45028DB-821f25108d7e4e0caa268ff3448ada5b.pdf, Height=7.4mm, Manufacturer_Part_Number=AMT0450028DB0000G, Mouser Price/Stock=https://www.mouser.co.uk/ProductDetail/Amphenol-Anytek/AMT0450028DB0000G?qs=ST9lo4GX8V0in%252BhOLfQ9xA%3D%3D
Lr1 Lr2 Lr3: "Inductor", Manufacturer_Name=Bourns, Datasheet Link=https://www.bourns.com/docs/product-datasheets/er26a.pdf, Height=17mm, Manufacturer_Part_Number=ER26A2DC-6R8K
Q1_D Q1_G Q1_S Q2_D Q2_G Q2_S Q3_D Q3_G Q3_S Q4_D Q4_G Q4_S: "Test Point", Manufacturer_Name="Keystone Electronics", Mouser Part Number=534-5013, Manufacturer_Part_Number=5013, Height=8.28mm, Datasheet Link=http://www.keyelco.com/product-pdf.cfm?p=1322, Mouser Price/Stock=https://www.mouser.co.uk/ProductDetail/Keystone-Electronics/5013?qs=qOqV1E1P08RLig9vMFtXag%3D%3D
Q1_HI Q2_LO Q3_HI Q4_LO: "MOSFET (N-Channel)", Manufacturer_Name=Infineon, Mouser Part Number=726-IPW65R050CFD7AXK, Arrow Part Number=IPW65R050CFD7AXKSA1, Arrow Price/Stock=https://www.arrow.com/en/products/ipw65r050cfd7axksa1/infineon-technologies-ag?region=europe, Datasheet Link=https://www.infineon.com/dgdl/Infineon-IPW65R050CFD7A-DataSheet-v02_01-EN.pdf?fileId=5546d46271bf4f920171c0167ea2084c, Height=5.3mm, Manufacturer_Part_Number=IPW65R050CFD7AXKSA1, Mouser Price/Stock=https://www.mouser.co.uk/ProductDetail/Infineon-Technologies/IPW65R050CFD7AXKSA1?qs=OlC7AqGiEDm4ztoS376shw%3D%3D
RDT1 RDT2: "Variable Resistor", Manufacturer_Name=Bourns, Mouser Part Number=652-3224W-1-104G, Arrow Part Number=3224W-1-104G, Arrow Price/Stock=https://www.arrow.com/en/products/3224w-1-104g/bourns, Datasheet Link=https://www.bourns.com/docs/product-datasheets/3224.pdf?sfvrsn=c872982f_10, Height=5.55mm, Manufacturer_Part_Number=3224W-1-104G, Mouser Price/Stock=https://www.mouser.co.uk/ProductDetail/Bourns/3224W-1-104G?qs=tEaODSGlU8NOeIAULE3a4g%3D%3D
RgA_1 RgA_2 RgB_1 RgB_2: "Resistor", Manufacturer_Name="ROHM Semiconductor", Mouser Part Number=755-ESR10EZPF15R0, Datasheet Link=https://fscdn.rohm.com/en/products/databook/datasheet/passive/resistor/chip_resistor/esr-e.pdf, Height=0.65mm, Manufacturer_Part_Number=ESR10EZPF15R0, Mouser Price/Stock=https://www.mouser.co.uk/ProductDetail/ROHM-Semiconductor/ESR10EZPF15R0?qs=DyUWGjl%252BcVuuTlFPYREySw%3D%3D
RgsA_1 RgsA_2 RgsB_1 RgsB_2: "Resistor", Manufacturer_Name="ROHM Semiconductor", Mouser Part Number=755-ESR18EZPF1002, Arrow Part Number=ESR18EZPF1002, Arrow Price/Stock=https://www.arrow.com/en/products/esr18ezpf1002/rohm-semiconductor, Datasheet Link=https://datasheet.datasheetarchive.com/originals/distributors/Datasheets_SAMA/30ccb516c688c96e56c83a00b77a93f4.pdf, Height=0.65mm, Manufacturer_Part_Number=ESR18EZPF1002, Mouser Price/Stock=https://www.mouser.com/Search/Refine.aspx?Keyword=755-ESR18EZPF1002
VDD_DC: "Connector", Arrow Part Number=B02B-XASK-1(LF)(SN), Manufacturer_Name="JST (JAPAN SOLDERLESS TERMINALS)", Mouser Part Number=N/A, Arrow Price/Stock=https://www.arrow.com/en/products/b02b-xask-1-lf-sn/jst-manufacturing?utm_currency=USD&region=europe, Datasheet Link=http://www.jst-mfg.com/product/pdf/eng/eXA1.pdf, Height=8.8mm, Manufacturer_Part_Number=B02B-XASK-1(LF)(SN), Mouser Price/Stock=https://www.mouser.co.uk/ProductDetail/JST-Commercial/B02B-XASK-1LFSN?qs=IKkN%2F947nfBty2GocXf7QA%3D%3D

## Via types
v1: diameter 1.27, hole 0.711, GND to GND/OUTPUT, 472 vias
v2: diameter 3, hole 3, GND to GND/OUTPUT, 4 vias

## Nets (pads, with @x,y where several pads share a name; then routed paths per layer and width w, separated by ;. In a path a pad name is that pad's centre, name@x,y a point inside that pad or via, vN(x,y) a via of type N, cw(c..) or ccw(c..) an arc to the next point about the centre after c; other vN are vias at no path point)
NetC1_2: C1.2 C2.1
NetC3_2: C3.2 C4.1
NetC5_2: C5.2 C6.1
NetC7_2: C7.2 C8.1
NetC9_2: C9.2 C10.1
NetC11_2: C11.2 C12.1
NetC13_2: C13.2 C14.1
NetC15_2: C15.2 C16.1
NetC_r1_2: C_r1.2 Lr1.F1
  other v1: 146.25,149.518 148.25,149.518 150.25,149.518 152.25,149.518 154.25,149.518 156.25,149.518 146.25,151.659 148.25,151.659 150.25,151.659 152.25,151.659 154.25,151.659 156.25,151.659 146.25,153.799 148.25,153.799 150.25,153.799 152.25,153.799 154.25,153.799 156.25,153.799 146.25,155.939 148.25,155.939 150.25,155.939 152.25,155.939 154.25,155.939 156.25,155.939 146.25,158.079 148.25,158.079 150.25,158.079 152.25,158.079 154.25,158.079 156.25,158.079 146.25,160.22 148.25,160.22 150.25,160.22 152.25,160.22 154.25,160.22 156.25,160.22 146.25,162.36 148.25,162.36 150.25,162.36 152.25,162.36 154.25,162.36 156.25,162.36 146.25,164.5 148.25,164.5 150.25,164.5 152.25,164.5 154.25,164.5 156.25,164.5
NetCdc_Q1_in_1: Cdc_Q1_in.1 Cdc_Q2_in.1 Cdc_Q3_in.1 Cdc_Q4_in.1 Cgdi1_1_1.1 Cgdi1_1_2.1 Cgdi1_2_1.1 Cgdi1_2_2.1 Cgdi2_1_1.1 Cgdi2_1_2.1 Cgdi2_2_1.1 Cgdi2_2_2.1 DCDC_Q1.2 DCDC_Q2.2 DCDC_Q3.2 DCDC_Q4.2 GD1.3 GD1.5 GD1.8 GD2.3 GD2.5 GD2.8 VDD_DC.1 | length 49.3
  GND w0.7: DCDC_Q1.2 52.23,121.231 52.23,118.246 Cdc_Q1_in.1 ; DCDC_Q4.2 52.23,135.701 52.23,132.61 Cdc_Q4_in.1 ; DCDC_Q3.2 52.23,165.704 52.23,162.665 Cdc_Q3_in.1 ; Cgdi1_1_1.1 57.24,109.84 57.24,107.26 v1(57.3,107.2) ; Cgdi2_1_1.1 57.185,154.245 57.185,151.325 v1(57.19,151.32) ; v1(60.475,142.15) 60.584,142.259 60.584,142.662 60.7,142.778 60.7,143.245 60.75,143.295 60.75,144.1 60.727,144.123 60.727,145.622 Cgdi2_2_1.1 ; v1(60.7,109.45) 60.725,109.425 60.725,108.43 60.75,108.405 Cgdi1_1_2.1 ; Cgdi2_2_1.1@60.727,145.402 60.727,145.377 60.824,145.28 61.209,145.28 61.234,145.255 GD2.8@63.563,145.255 ; Cgdi1_1_2.1@60.75,107.6 60.965,107.385 62.881,107.385 GD1.3 ; v1(60.75,153.75) 60.75,153.487 60.75,152.705 60.75,152.058 61.794,152.058 62.222,151.63 62.881,151.63 GD2.3 GD2.3@63.563,151.605 ; v1@60.818,149.082 GD2.5@62.506,149.082 ; Cgdi1_2_1.1 60.923,101.326 60.923,99.844 60.932,99.835 60.932,98.157 v1(60.925,98.15) ; v1(60.9,104.8) 60.91,104.81 62.896,104.81 GD1.5 ; Cgdi1_2_1.1@60.923,101.174 60.923,101.081 60.94,101.064 61.296,101.064 61.35,101.01 GD1.8 ; GD2.5@63.306,149.065 GD2.5@63.563,149.065
  HVDC w0.7: v1(57.19,151.32) 59.41,149.1 v1(60.8,149.1) ; v1(57.3,107.2) 57.309,107.191 58.509,107.191 v1(60.9,104.8)
NetCdc_Q1_in_2: Cdc_Q1_in.2 Cdc_Q2_in.2 Cdc_Q3_in.2 Cdc_Q4_in.2 CDT1.2 CDT2.2 Cgdi1_1_1.2 Cgdi1_1_2.2 Cgdi1_2_1.2 Cgdi1_2_2.2 Cgdi2_1_1.2 Cgdi2_1_2.2 Cgdi2_2_1.2 Cgdi2_2_2.2 DCDC_Q1.1 DCDC_Q2.1 DCDC_Q3.1 DCDC_Q4.1 FG_1.2 FG_1.3 FG_1.4 FG_1.5 FG_2.2 FG_2.3 FG_2.4 FG_2.5 GD1.4 GD2.4 RDT1.1 RDT2.1 VDD_DC.2 | length 53.7
  GND w0.7: Cdc_Q1_in.2 DCDC_Q1.1 ; Cdc_Q4_in.2 DCDC_Q4.1 ; Cdc_Q3_in.2 DCDC_Q3.1 ; RDT1.1 54.6,101.364 56.136,99.828 57.018,99.828 57.146,99.7 58.647,99.7 58.683,99.664 59.04,99.664 Cgdi1_2_2.2 59.04,100.112 59.09,100.162 59.09,101.339 Cgdi1_2_1.2 ; RDT2.1 54.6,145.58 56.252,143.928 57.118,143.928 57.246,143.8 Cgdi2_2_2.2 58.85,144.305 58.9,144.355 58.9,144.87 58.944,144.914 58.944,145.525 Cgdi2_2_1.2 ; v1(56.75,149.525) 56.904,149.525 57.129,149.75 CDT2.2 ; v1(57.3,105.2) 57.409,105.309 57.812,105.309 57.903,105.4 CDT1.2@58.65,105.4 ; Cgdi1_1_1.2 58.835,109.885 58.835,108.215 58.85,108.2 58.85,105.45 59.3,105.45 59.94,106.09 GD1.4 ; Cgdi2_1_1.2@58.835,154.235 58.835,152.515 58.85,152.5 58.85,149.75 CDT2.2@58.9,149.75 ; CDT2.2@59.3,149.75 60.05,150.5 62.366,150.5 62.506,150.36 62.881,150.36 GD2.4 GD2.4@63.563,150.335
  GND/OUTPUT w0.7: VDD_DC.2 DCDC_Q2.1
  other v1: 57.3,99.7 57.4,143.8
NetCdc_Q1_out_1: Cdc_Q1_out.1 Cgda1_1.1 Cgda1_2.1 DCDC_Q1.4 GD1.16 | length 23.7
  GND w0.7: DCDC_Q1.4 57.2,118.141 61.109,118.141 68.36,110.89 68.36,109.925 GD1.16@68.331,109.925 ; Cgda1_1.1 72.992,111.335 71.622,111.335 71.607,111.35 71.007,111.35 69.582,109.925 GD1.16@68.331,109.925 ; GD1.16@68.331,109.925 GD1.16 GD1.16@68.331,109.925
NetCdc_Q2_out_1: Cdc_Q2_out.1 Cgdb1_1.1 Cgdb1_2.1 DCDC_Q2.4 GD1.11 | length 33
  GND w0.7: GD1.11 68.331,103.525 Cgdb1_2.1 ; Cgdb1_2.1@72.7,103.575 Cgdb1_1.1@74.18,103.575 ; Cgdb1_1.1 74.595,103.645 75.65,102.59 v1(75.65,102.55)
  HVDC w0.7: v1(61.45,93.9) 69.075,93.9 75.65,100.475 v1(75.65,102.55)
  GND/OUTPUT w0.7: DCDC_Q2.4 Cdc_Q2_out.1 60.755,93.525 61.021,93.791 61.341,93.791 v1(61.45,93.9)
NetCdc_Q3_out_1: Cdc_Q3_out.1 Cgda2_1.1 Cgda2_2.1 DCDC_Q3.4 GD2.16 | length 23.8
  GND w0.7: DCDC_Q3.4 Cdc_Q3_out.1 61.75,162.75 68.306,156.194 GD2.16 ; GD2.16@68.847,154.145 69.307,154.145 70.982,155.82 71.787,155.82 71.813,155.845 72.882,155.845 Cgda2_1.1
NetCdc_Q4_out_1: Cdc_Q4_out.1 Cgdb2_1.1 Cgdb2_2.1 DCDC_Q4.4 GD2.11 | length 32.9
  GND w0.7: GD2.11@68.963,147.795 68.983,147.815 72.302,147.815 72.352,147.765 Cgdb2_2.1 ; Cgdb2_2.1@72.907,147.815 74.477,147.815 Cgdb2_1.1 74.802,147.895 75.85,146.847 v1(75.85,146.8)
  HVDC w0.7: v1(61.45,138.15) 68.925,138.15 75.85,145.075 v1(75.85,146.8)
  GND/OUTPUT w0.7: DCDC_Q4.4 Cdc_Q4_out.1 57.27,138.08 61.405,138.08 v1@61.475,138.15
NetCDT1_1: CDT1.1 GD1.6 RDT1.2 RDT1.3 | length 12.1
  GND w0.7: RDT1.2 51.55,102.814 52.6,103.864 58.386,103.864 58.7,103.55 GD1.6
NetCDT2_1: CDT2.1 GD2.6 RDT2.2 RDT2.3 | length 11.9
  GND w0.7: RDT2.2@51.55,147.2 51.55,147.4 52.19,148.04 52.6,148.45 RDT2.3@54.45,148.45 ; RDT2.3 58.47,148.08 58.7,147.85 CDT2.1@58.95,147.85 ; CDT2.1@59.03,147.85 59.505,147.85 59.535,147.82 GD2.6@62.506,147.82 ; GD2.6@63.306,147.795 GD2.6@63.563,147.795
NetFG_1_1: FG_1.1 GD1.1 | length 11.7
  GND w0.7: FG_1.1 56.241,111 56.46,111.219 61.212,111.219 GD1.1@62.506,109.925
NetFG_2_1: FG_2.1 GD2.1 | length 12.3
  GND w0.7: FG_2.1 51.95,155.7 60.976,155.7 GD2.1@62.506,154.17 ; GD2.1@63.138,154.145 GD2.1@63.563,154.145
NetGD1_10: GD1.10 RgB_1.1 | length 14.6
  GND w1: GD1.10 71.29,102.28 RgB_1.1@79.5,94.07
NetGD1_15: GD1.15 RgA_1.1 | length 16.1
  GND w0.7: GD1.15 GD1.15@68.92,108.63
  GND w1: GD1.15@68.92,108.63 70.13,108.63 71.45,109.95 75.7,109.95 79.55,113.8 RgA_1.1
NetGD2_10: GD2.10 RgB_2.1 | length 13.2
  GND w1: GD2.10@68.963,146.525 69.975,146.525 77.506,138.994 RgB_2.1
NetGD2_15: GD2.15 RgA_2.1 | length 15.8
  GND w1: GD2.15@68.963,152.875 69.875,152.875 71.55,154.55 75.3,154.55 79.5,158.75 RgA_2.1
NetLr1_S1: Lr1.S1 P+.1 P+.2 P+.3 P+.4
  other v1: 172.25,157.401 174.273,157.401 176.295,157.401 178.318,157.401 180.341,157.401 172.25,159.5 174.273,159.5 176.295,159.5 178.318,159.5 180.341,159.5 172.25,161.401 174.273,161.401 176.295,161.401 178.318,161.401 180.341,161.401 172.25,163.5 174.273,163.5 176.295,163.5 178.318,163.5 180.341,163.5
NetLr2_F1: Lr2.F1 Lr3.S1
  other v1: 114,197.5 116,197.5 118,197.5 120,197.5 110,199.625 112,199.625 114,199.625 116,199.625 118,199.625 120,199.625 110,201.75 112,201.75 114,201.75 116,201.75 118,201.75 120,201.75 106,203.875 108,203.875 110,203.875 112,203.875 114,203.875 116,203.875 118,203.875 120,203.875 104,206 106,206 108,206 110,206 112,206 114,206 116,206 118,206 120,206 104,208.125 106,208.125 108,208.125 110,208.125 112,208.125 114,208.125 104,210.25 106,210.25 108,210.25 110,210.25 112,210.25 114,210.25 104,212.375 106,212.375 108,212.375 110,212.375 104,214.5 106,214.5 108,214.5 110,214.5
NetLr3_F1: Lr3.F1 P-.1 P-.2 P-.3 P-.4
  other v1: 144,195.36 146.023,195.36 148.045,195.36 150.068,195.36 152.091,195.36 154.114,195.36 156.136,195.36 158.159,195.36 160.182,195.36 162.205,195.36 164.227,195.36 144,197.459 146.023,197.459 148.045,197.459 150.068,197.459 152.091,197.459 154.114,197.459 156.136,197.459 158.159,197.459 160.182,197.459 162.205,197.459 164.227,197.459 166.25,197.459 144,199.558 146.023,199.558 148.045,199.558 150.068,199.558 152.091,199.558 154.114,199.558 156.136,199.558 158.159,199.558 160.182,199.558 162.205,199.558 164.227,199.558 166.25,199.558 144,201.657 146.023,201.657 148.045,201.657 150.068,201.657 152.091,201.657 154.114,201.657 156.136,201.657 158.159,201.657 160.182,201.657 162.205,201.657 164.227,201.657 166.25,201.657 144,203.755 146.023,203.755 148.045,203.755 150.068,203.755 152.091,203.755 154.114,203.755 156.136,203.755 158.159,203.755 160.182,203.755 162.205,203.755 164.227,203.755 166.25,203.755 144,205.854 146.023,205.854 148.045,205.854 150.068,205.854 152.091,205.854 154.114,205.854 156.136,205.854 158.159,205.854 160.182,205.854 162.205,205.854 164.227,205.854 166.25,205.854 156.136,207.953 158.159,207.953 160.182,207.953 162.205,207.953 164.227,207.953 166.25,207.953 156.136,210.052 158.159,210.052 160.182,210.052 162.205,210.052 164.227,210.052 166.25,210.052 156.136,212.151 158.159,212.151 160.182,212.151 162.205,212.151 164.227,212.151 166.25,212.151 156.136,214.25 158.159,214.25 160.182,214.25 162.205,214.25 164.227,214.25 166.25,214.25
Q1_D: C1.1 C3.1 C5.1 C7.1 C9.1 C11.1 C13.1 C15.1 C_in_1.1 C_in_2.1 IN+.1 IN+.2 IN+.3 IN+.4 Q1_D.1 Q1_HI.2 Q3_D.1 Q3_HI.2
  other v1: 119,98.547 121,98.547 123,98.547 125,98.547 119,100.7 121,100.7 123,100.7 125,100.7 119,102.586 121,102.586 123,102.586 125,102.586 119,104.74 121,104.74 123,104.74 125,104.74 119,106.893 121,106.893 123,106.893 125,106.893 119,109.047 121,109.047 123,109.047 125,109.047 119,111.2 121,111.2 123,111.2 125,111.2 119,113.365 121,113.365 123,113.365 125,113.365 119,115.518 121,115.518 123,115.518 125,115.518 119,117.672 121,117.672 123,117.672 125,117.672 119,119.825 121,119.825 123,119.825 125,119.825 119,121.978 121,121.978 123,121.978 125,121.978 118.625,143.525 120.625,143.525 122.625,143.525 124.625,143.525 126.625,143.525 128.625,143.525 118.625,145.707 120.625,145.707 122.625,145.707 124.625,145.707 126.625,145.707 128.625,145.707 118.625,147.889 120.625,147.889 122.625,147.889 124.625,147.889 126.625,147.889 128.625,147.889 118.625,150.07 120.625,150.07 122.625,150.07 124.625,150.07 126.625,150.07 128.625,150.07 118.625,152.252 120.625,152.252 122.625,152.252 124.625,152.252 126.625,152.252 128.625,152.252 118.625,154.434 120.625,154.434 122.625,154.434 124.625,154.434 126.625,154.434 128.625,154.434 118.625,156.616 120.625,156.616 122.625,156.616 124.625,156.616 126.625,156.616 128.625,156.616 118.625,158.798 120.625,158.798 122.625,158.798 124.625,158.798 126.625,158.798 128.625,158.798 118.625,160.98 120.625,160.98 122.625,160.98 124.625,160.98 126.625,160.98 128.625,160.98 118.625,163.161 120.625,163.161 122.625,163.161 124.625,163.161 126.625,163.161 128.625,163.161 118.625,165.343 120.625,165.343 122.625,165.343 124.625,165.343 126.625,165.343 128.625,165.343 118.625,167.525 120.625,167.525 122.625,167.525 124.625,167.525 126.625,167.525 128.625,167.525
Q1_G: Q1_G.1 Q1_HI.1 RgA_1.2 RgsA_1.1 | length 19.6
  GND w0.7: Q1_HI.1@85.305,116.5 Q1_HI.1
  GND w1: RgsA_1.1 81.05,117.1 81.45,116.7 RgA_1.2
  GND w2: RgA_1.2 Q1_HI.1@85.305,116.5 ; Q1_G.1 81.5,110.608 81.7,110.808 81.7,110.95 84.978,114.228 84.978,116.037 Q1_HI.1
Q1_S: C_r1.1 Cdc_Q1_out.2 Cgda1_1.2 Cgda1_2.2 DCDC_Q1.3 GD1.14 Q1_HI.3 Q1_S.1 Q2_D.1 Q2_LO.2 RgsA_1.2 | length 10.1
  GND w0.7: GD1.14 70.421,107.36 71.136,108.075 v1(72.6,108.075) ; Cgda1_2.2@71.4,113.25 71.4,114.5 72.125,115.225 v1(73.1,115.225) Cgda1_1.2@73.1,112.96
  other v1: 78.389,127.29
Q2_G: Q2_G.1 Q2_LO.1 RgB_1.2 RgsB_1.1 | length 17.5
  GND w0.7: Q2_LO.1 Q2_LO.1@85.5,93.743
  GND w1: RgsB_1.1 81,94.47 81.4,94.07 RgB_1.2
  GND w2: RgB_1.2 Q2_LO.1 ; Q2_G.1 Q2_LO.1@85.5,93.743
Q2_S: C2.2 C4.2 C6.2 C8.2 C10.2 C12.2 C14.2 C16.2 C_in_1.2 C_in_2.2 Cdc_Q2_out.2 Cdc_Q4_out.2 Cgdb1_1.2 Cgdb1_2.2 Cgdb2_1.2 Cgdb2_2.2 DCDC_Q2.3 DCDC_Q4.3 GD1.9 GD2.9 IN-.1 IN-.2 IN-.3 IN-.4 Q2_LO.3 Q2_S.1 Q4_LO.3 Q4_S.1 RgsB_1.2 RgsB_2.2 | length 4.1
  GND w0.7: GD1.9 68.731,101.01 69.816,99.925 69.816,99.659 v1(69.925,99.55) ; GD2.9@68.963,145.255 69.372,144.846 69.372,144.256 69.391,144.237 69.391,143.834 v1(69.5,143.725)
  other v1: 98.25,74.807 100.273,74.807 102.295,74.807 104.318,74.807 106.341,74.807 108.364,74.807 110.386,74.807 112.409,74.807 114.432,74.807 116.455,74.807 118.477,74.807 120.5,74.807 98.25,76.922 100.273,76.922 102.295,76.922 104.318,76.922 106.341,76.922 108.364,76.922 110.386,76.922 112.409,76.922 114.432,76.922 116.455,76.922 118.477,76.922 120.5,76.922 98.25,79.038 100.273,79.038 102.295,79.038 104.318,79.038 106.341,79.038 108.364,79.038 110.386,79.038 112.409,79.038 114.432,79.038 116.455,79.038 118.477,79.038 120.5,79.038 98.25,81.153 100.273,81.153 102.295,81.153 104.318,81.153 106.341,81.153 108.364,81.153 110.386,81.153 112.409,81.153 114.432,81.153 116.455,81.153 118.477,81.153 120.5,81.153 98.25,83.269 100.273,83.269 102.295,83.269 104.318,83.269 106.341,83.269 108.364,83.269 110.386,83.269 112.409,83.269 114.432,83.269 116.455,83.269 118.477,83.269 120.5,83.269 98.25,85.384 100.273,85.384 102.295,85.384 104.318,85.384 106.341,85.384 108.364,85.384 110.386,85.384 112.409,85.384 114.432,85.384 116.455,85.384 118.477,85.384 120.5,85.384 98.25,87.5 100.273,87.5 102.295,87.5 104.318,87.5 106.341,87.5 108.364,87.5 110.386,87.5 112.409,87.5 114.432,87.5 116.455,87.5 118.477,87.5 120.5,87.5 56.875,95.475 76.35,105.3 56.1,139.575 76.55,149.15
Q3_G: Q3_G.1 Q3_HI.1 RgA_2.2 RgsA_2.1 | length 19.3
  GND w0.7: RgsA_2.1 81.175,169.537 81.4,169.312 RgsA_2.1@81.4,169.262 ; Q3_HI.1@85.363,161.547 Q3_HI.1
  GND w1: RgA_2.2 RgsA_2.1@81.4,169.262
  GND w2: RgA_2.2 Q3_HI.1 ; Q3_G.1 81.75,156.108 81.95,156.308 81.95,156.45 84.978,159.478 84.978,161.162 Q3_HI.1@85.363,161.547
Q3_S: Cdc_Q3_out.2 Cgda2_1.2 Cgda2_2.2 DCDC_Q3.3 GD2.14 Lr2.S1 Q3_HI.3 Q3_S.1 Q4_D.1 Q4_LO.2 RgsA_2.2 | length 10
  GND w0.7: GD2.14@68.963,151.605 70.64,151.605 71.51,152.475 v1(72.675,152.475) ; Cgda2_2.2@71.282,157.715 71.282,159.193 71.962,159.872 72.693,159.872 72.821,160 v1(72.975,160) 72.979,159.996 72.979,157.589 Cgda2_1.2
  other v1: 78.339,172.414 92.5,184.705 94.5,184.705 96.5,184.705 98.5,184.705 100.5,184.705 102.5,184.705 92.5,186.886 94.5,186.886 96.5,186.886 98.5,186.886 100.5,186.886 102.5,186.886 92.5,189.068 94.5,189.068 96.5,189.068 98.5,189.068 100.5,189.068 102.5,189.068 92.5,191.25 94.5,191.25 96.5,191.25 98.5,191.25 100.5,191.25 102.5,191.25
Q4_G: Q4_G.1 Q4_LO.1 RgB_2.2 RgsB_2.1 | length 20.1
  GND w0.7: Q4_G.1 Q4_G.1@80.571,135.321 ; Q4_LO.1@85.301,138.922 Q4_LO.1
  GND w1: RgB_2.2@81,138.994 RgsB_2.1@81,146.8
  GND w2: Q4_G.1@80.571,135.321 83.571,135.321 85.301,137.051 Q4_LO.1@85.301,138.922 ; RgB_2.2 Q4_LO.1
pads on no net: GD1.2 GD1.7 GD1.12 GD1.13 GD2.2 GD2.7 GD2.12 GD2.13
copper on no net:
  other v2: 44.975,70.45 186.15,70.45 44.975,230.325 186.15,230.325

## Polygon pours and split planes (outlines as drawn)
Q2_S on GND/OUTPUT "Q2_S_L04_P174" (solid, pour order 174): 53.65,91 54.05,90.6 55.125,90.6 56,91.475 56,94.275 56.6,94.875 57.25,94.875 57.725,95.35 57.725,96.175 57.575,96.325 55.95,96.325 53.65,94.025
Q3_S on GND/OUTPUT "GND/OUTPUT-Q3_S" (solid, pour order 193): 53.9,164.575 56.825,161.65 60.175,161.65 66.25,155.575 66.25,152.95 67.475,151.725 73,151.725 73.975,152.7 73.975,159.5 84.849,170.374 89.876,170.374 91.725,168.525 91.725,165.35 89.725,163.407 89.725,149.175 89.763,149.137 86.75,146.124 84.25,146.124 82.75,144.624 82.75,142.624 83.75,141.624 90.524,141.624 99.85,150.95 99.85,174.85 99.85,179.726 105.25,185.126 105.25,199.75 101.25,203.75 91.55,203.75 90.025,202.225 90.025,179.4 89.7,179.075 83.825,179.075 82.15,177.4 82.15,177.225 79.075,177.225 70.35,168.5 55.125,168.5 53.925,167.3 53.925,164.6
Q1_S on GND/OUTPUT "GND/OUTPUT-Q1_S" (solid, pour order 192): 66.175,108.55 67.4,107.325 72.925,107.325 73.9,108.3 73.9,114.15 85,125.25 89.5,125.25 91.6,123.15 91.6,119.75 89.25,117.4 89.25,103.5 86.75,101 84.25,101 82.75,99.5 82.75,97.5 83.75,96.5 91,96.5 99,104.5 99,121.95 103.05,126 148.5,126 149.95,127.45 149.95,135.05 144.85,140.15 95.4,140.15 88.775,133.525 84.4,133.525 82.875,132 80.1,132 72.127,124.027 55.125,124.027 53.9,122.802 53.9,120.102 56.825,117.177 60.175,117.177 66.175,111.177
NetCdc_Q1_in_1 on GND/OUTPUT "GND/OUTPUT-NetCdc_Q1_in_1" (solid, pour order 170): 50.75,82.5 51.25,82 52.75,82 53.25,82.5 53.25,95 55.25,97 61.5,97 64.75,100.25 64.75,110.75 59,116.5 55,116.5 53.375,118.125 53.375,139.445 54.93,141 61.18,141 64.75,144.57 64.75,155 58.93,160.82 55,160.82 53.5,162.32 53.5,166.82 52.75,167.57 51.25,167.57 50.75,167.07 50.75,161.57 53,159.32 55.5,159.32 59.5,155.32 59.5,143.32 58.93,142.75 53.18,142.75 50.75,140.32 50.75,120.337 50.75,117.25 53,115 56.75,115 59.5,112.25 59.5,99 59.25,98.75 53.5,98.75 50.75,96
Q2_S on GND/OUTPUT "Q2_S_L04_P184" (solid, pour order 184): 53.775,135.195 54.05,134.92 55.125,134.92 56,135.795 56,138.595 56.6,139.195 57.25,139.195 57.725,139.67 57.725,140.3 55.605,140.3 53.775,138.47
NetLr2_F1 on GND/OUTPUT "NETLR2_F1_L04_P154" (solid, pour order 154): 92.75,216.25 89.75,213.25 89.75,207.75 92.25,205.25 102.772,205.25 113.022,194 130.75,194 130.975,194.225 130.975,208.25 118.25,208.25 114.5,212 110.25,216.25
NetC_r1_2 on GND/OUTPUT "NETC_R1_2_L04_P150" (solid, pour order 150): 142.603,167.103 138,162.5 138,152.75 143.5,147.25 164.5,147.25 166.9,149.65 166.9,157.1 156.897,167.103
NetLr1_S1 on GND/OUTPUT "NETLR1_S1_L04_P147" (solid, pour order 147): 169.75,154 169.75,148.125 179.125,148.125 183,152 183,181.75 179.5,185.25 166.75,185.25 160,178.5 160,169.5 169.75,159.75
NetLr3_F1 on GND/OUTPUT "NETLR3_F1_L04_P146" (solid, pour order 146): 165,227.75 152.25,215 152.25,209.75 150.5,208 136.25,208 133.75,205.5 133.75,197.75 139.25,192.25 164,192.25 181.75,210 184.25,212.5 184.25,226 181.75,228.5 165.75,228.5
Q2_S on SIG "Q2_S_L02_P175" (solid, pour order 175): 66.425,148.4 68.925,150.9 68.975,150.85 74.425,150.85 74.925,151.35 86.925,151.35 87.95,150.325 87.95,147.62 81.276,147.62 74.483,140.828 74.483,139.778 67.925,133.22 54.825,133.22 54.125,133.92 54.125,138.795 55.555,140.225 62.48,140.225 66.425,144.17
Q2_S on SIG "GND-Q2_S" (solid, pour order 179): 104.825,97.675 93.525,97.675 91.7,95.9 91.7,78.05 97.75,72 179,72 183.5,76.5 183.5,116 179,120.5 147.5,120.5 141.25,114.25 141.25,96.5 135.25,90.5 112,90.5
Q2_S on SIG "Q2_S_L02_P173" (solid, pour order 173): 66.4,104.025 69.025,106.65 86.601,106.65 87.95,105.301 87.95,103.3 86.85,102.2 80.176,102.2 74.483,96.508 74.483,95.458 67.925,88.9 54.825,88.9 53.9,89.825 53.9,94.25 55.975,96.325 62.9,96.325 66.4,99.825
NetCdc_Q1_in_2 on SIG "NETCDC_Q1_IN_2_L02_P172" (solid, pour order 172): 46.5,170.95 47.525,172 52.75,172 53.5,171.25 53.5,162.3 54.975,160.825 58.925,160.825 64.75,155 64.75,144.575 61.175,141 54.925,141 53.5,139.575 53.5,118 55,116.5 59,116.5 64.75,110.75 64.75,100.25 61.5,97 55.25,97 53.275,95.025 53.275,82.3 52.475,81.5 49.25,81.5 46.5,84.25
Q2_S on GND "GND-Q2_S" (solid, pour order 196): 89.6,102.876 91.7,100.776 91.7,78.05 97.75,72 179,72 183.5,76.5 183.5,116 179,120.5 147.5,120.5 141.25,114.25 141.25,96.5 135.25,90.5 112,90.5 104.767,97.733 104.767,175.983 102.25,178.5 94.75,178.5 91.5,175.25 91.5,158.775 89.975,157.25 86.45,157.25 83.825,154.625 83.825,153.7 82.875,152.75 81.475,151.35 74.85,151.35 74,150.5 72.075,150.5 71.625,150.05 71.625,149.15 71.65,149.15 72.1,148.7 75.675,148.7 76.363,148.012 82.875,148.012 82.887,148 89.525,148 91.95,145.575 91.95,114.825 89.55,112.425 86.7,112.425 84.75,110.475 84.75,108.925 83.45,107.626 82.474,106.65 71.475,106.65 71,106.175 71,105.275 71.825,104.45 78.85,104.45 80.424,102.876
Q3_S on GND "Q3_S_L01_P194" (solid, pour order 194): 53.9,167.3 53.9,164.575 53.925,164.575 55.05,163.45 55.05,161.925 56.125,161.925 56.125,164.975 55.475,165.625 55.475,166.9 54.975,167.4 54.975,167.425 54.025,167.425
Q1_S on GND "Q1_S_L01_P195" (solid, pour order 195): 53.9,122.827 53.9,120.102 53.925,120.102 55.05,118.977 55.05,117.452 56.025,117.452 56.025,120.602 55.475,121.152 55.475,122.427 54.975,122.927 54.975,122.952 54.025,122.952
Q3_S on GND "Q3_S_L01_P129" (solid, pour order 129): 77.25,174.25 77.75,174.75 87.25,174.75 87.75,174.25 87.75,171.25 87.25,170.75 77.75,170.75 77.25,171.25
NetC9_2 on GND "NETC9_2_L01_P162" (solid, pour order 162): 106,102.01 106.25,102.26 110.75,102.26 111,102.01 111,97.76 110.75,97.51 106.25,97.51 106,97.76
NetC15_2 on GND "NETC15_2_L01_P161" (solid, pour order 161): 106,109.01 106.25,109.26 110.75,109.26 111,109.01 111,104.76 110.75,104.51 106.25,104.51 106,104.76
NetC13_2 on GND "NETC13_2_L01_P160" (solid, pour order 160): 106,116.01 106.25,116.26 110.75,116.26 111,116.01 111,111.76 110.75,111.51 106.25,111.51 106,111.76
NetC11_2 on GND "NETC11_2_L01_P159" (solid, pour order 159): 106,123.01 106.25,123.26 110.75,123.26 111,123.01 111,118.76 110.75,118.51 106.25,118.51 106,118.76
NetC1_2 on GND "NETC1_2_L01_P158" (solid, pour order 158): 106,147.25 106.25,147.5 110.75,147.5 111,147.25 111,143 110.75,142.75 106.25,142.75 106,143
NetC3_2 on GND "NETC3_2_L01_P157" (solid, pour order 157): 106,154.25 106.25,154.5 110.75,154.5 111,154.25 111,150 110.75,149.75 106.25,149.75 106,150
NetC5_2 on GND "NETC5_2_L01_P156" (solid, pour order 156): 106,161.25 106.25,161.5 110.75,161.5 111,161.25 111,157 110.75,156.75 106.25,156.75 106,157